# Altium PCB BetaBake_REV_1.0.PcbDoc (part 1 of 8)
Units mil, origin at the board's own origin, x right, y up, seen from the top; angles counter-clockwise.
Board outline 6000 x 4000 mil, 8 copper layers (USB 2.0 (90 Diff) DDR3 Data (50-100), GND (Top Layer high-speed return paths), DDR3 Fly-by Routing (Address, Command, Control), QSPI Flash (Clk, IO), Int4 PWR, Int5 GND (Shielding between L4 and L6), Int6 eMMC High-Speed Data Lines (8-bit bus), SDIO/peripherals, Int7 GND, Escapes, non-critical tracks, decoupling capacitor vias), stack 60.424 mil thick; 426 components, 331 nets, 1941 pads, 428 vias.
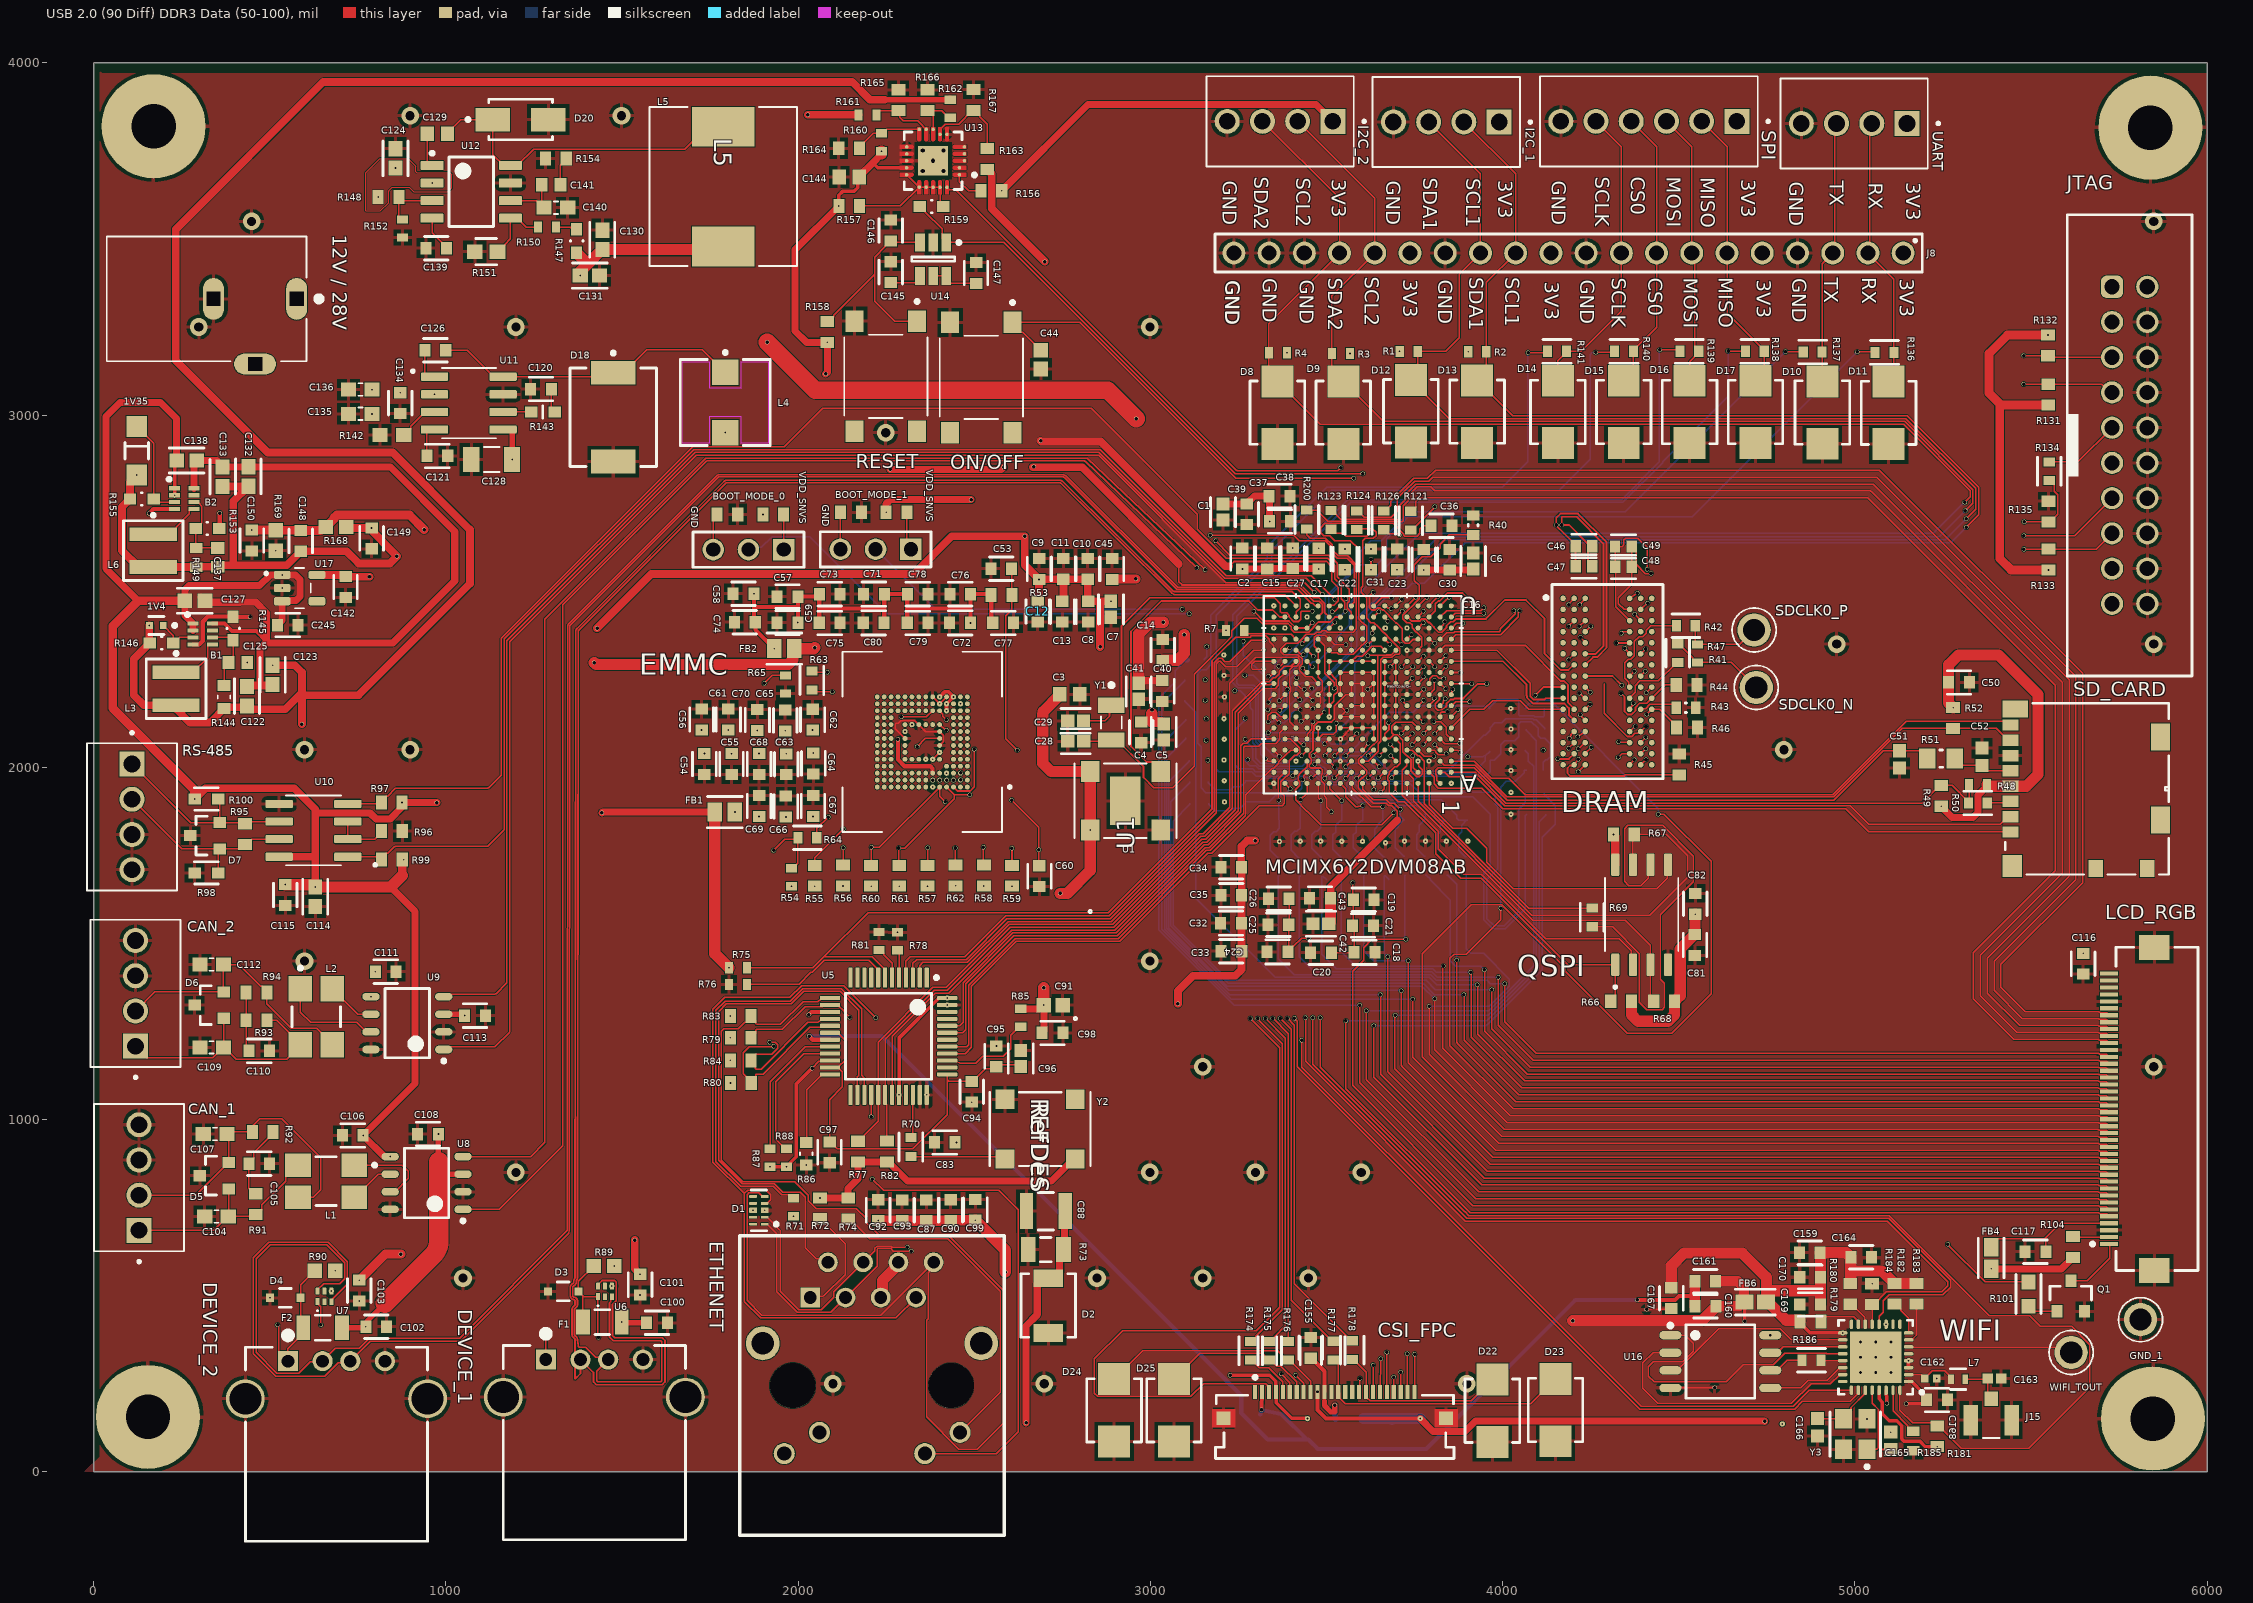
[diagram p0: USB 2.0 (90 Diff) DDR3 Data (50-100) view]
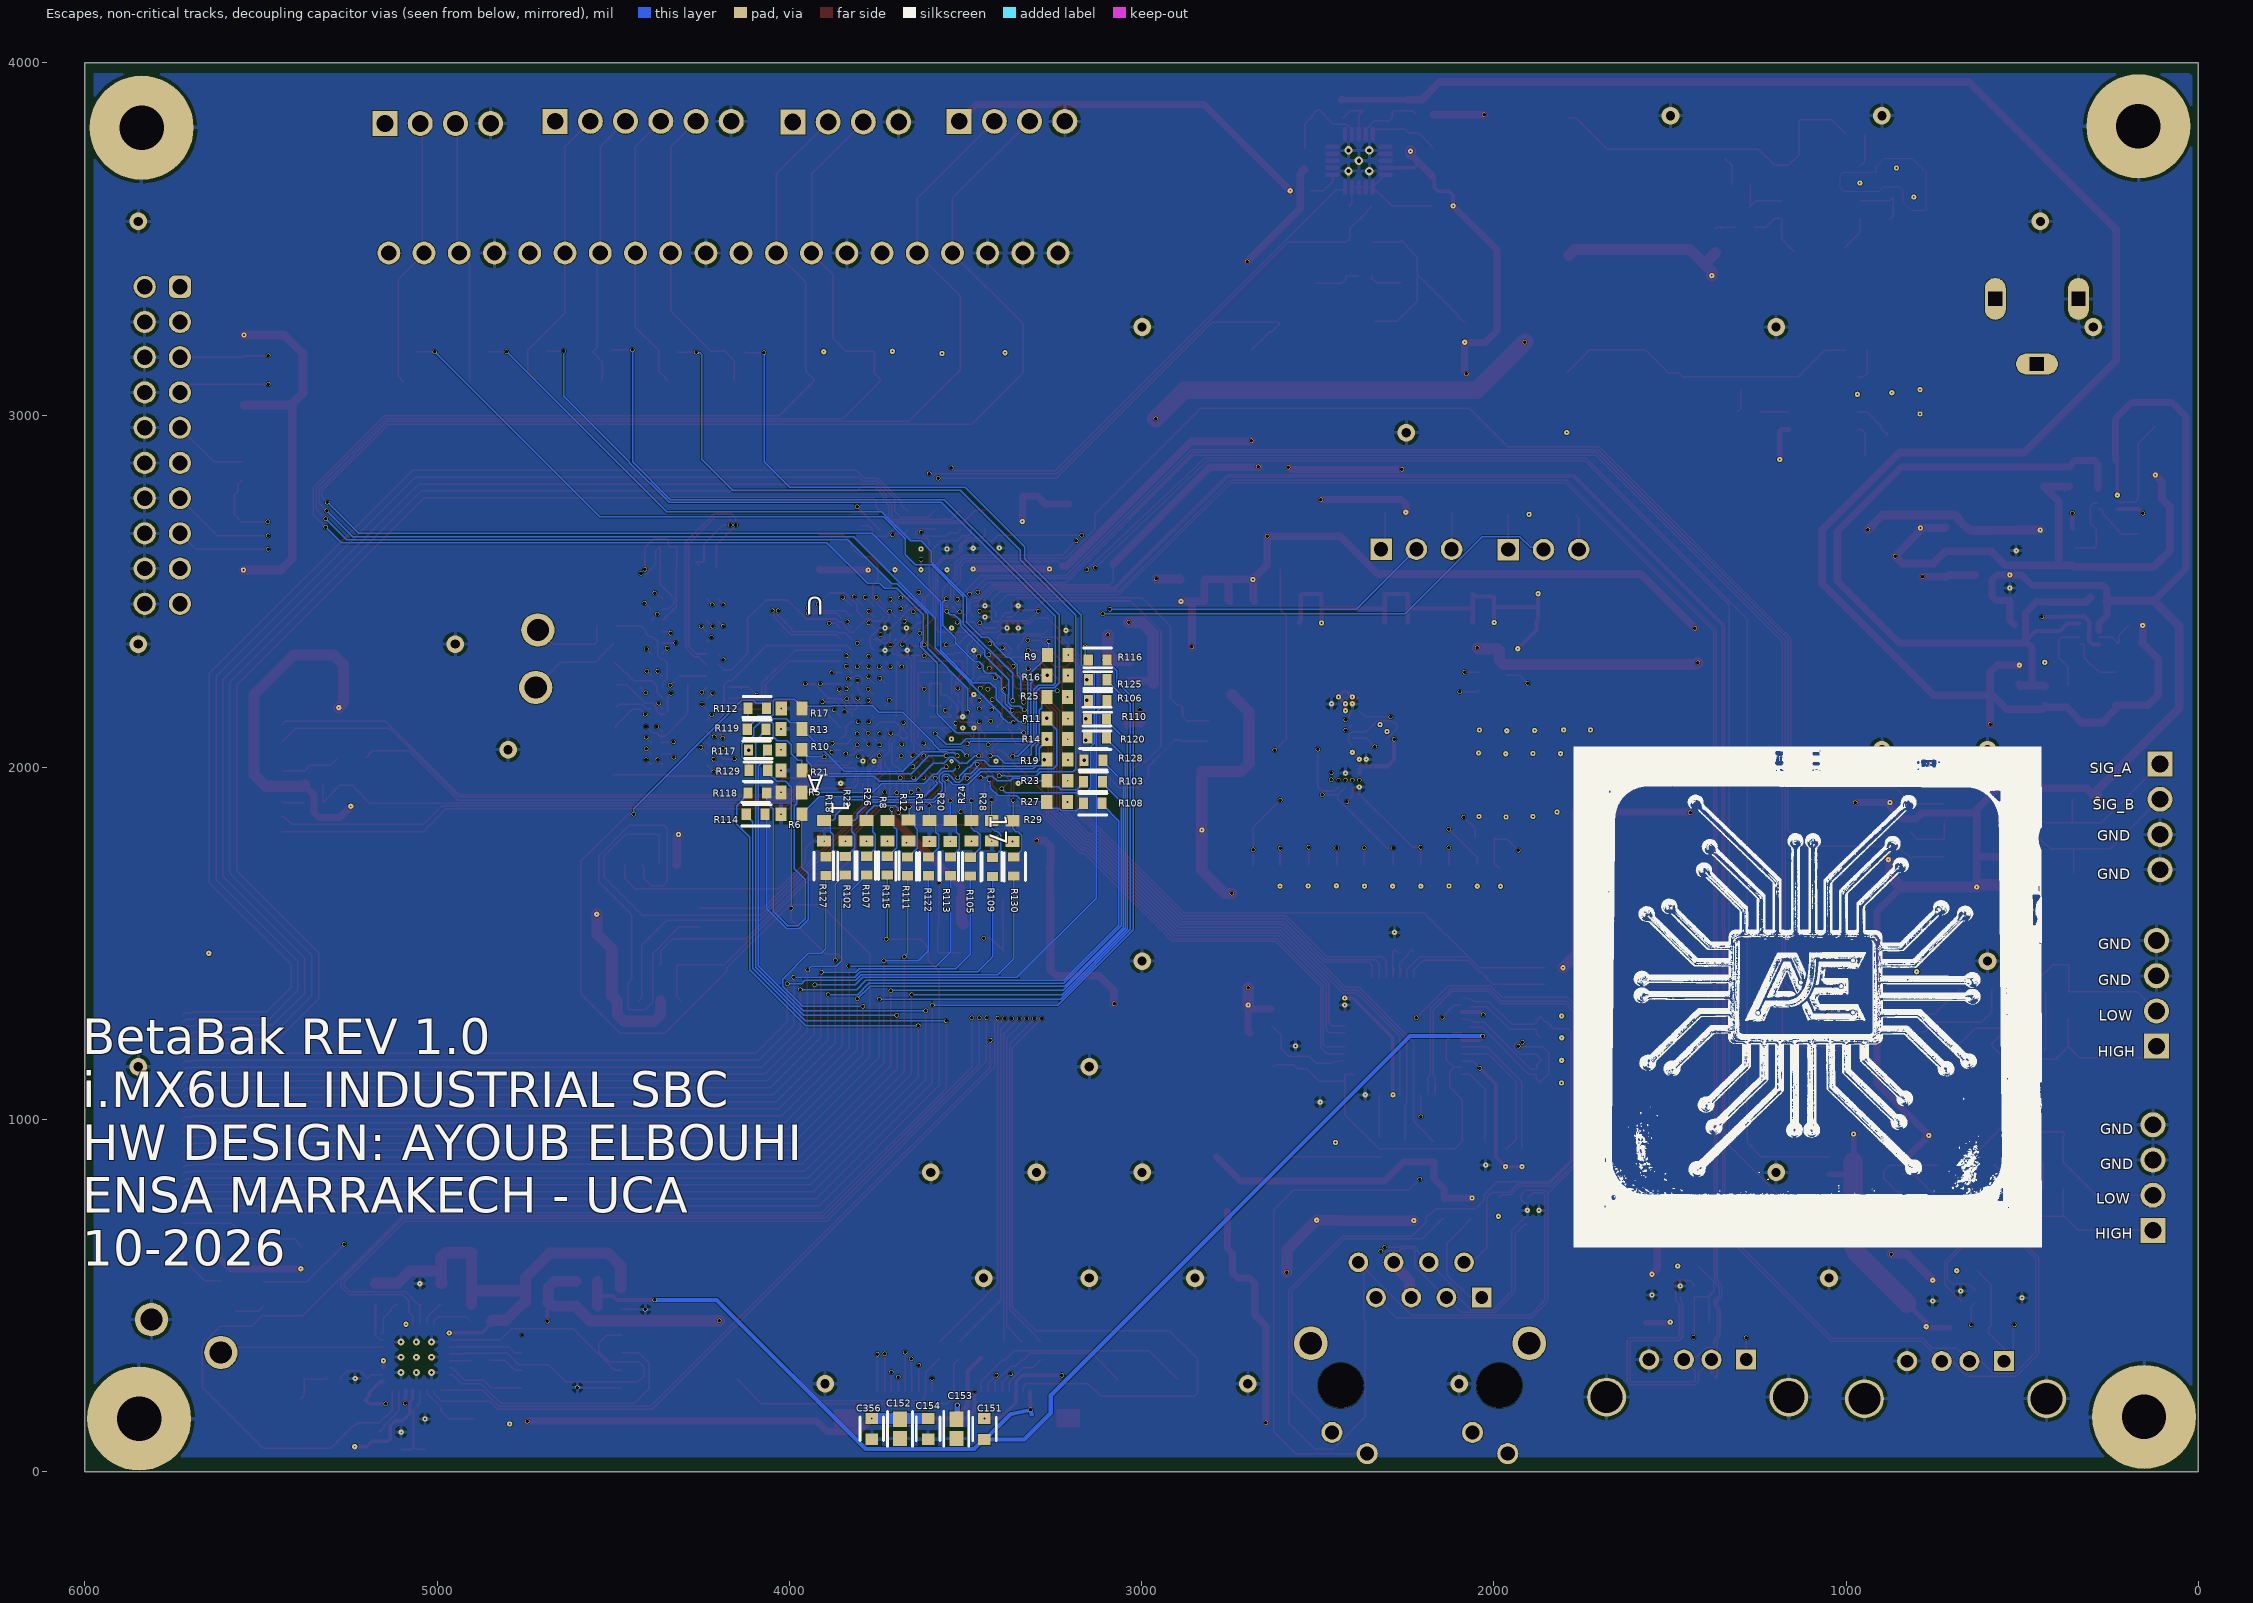
[diagram p1: Escapes, non-critical tracks, decoupling capacitor vias view, seen from below]
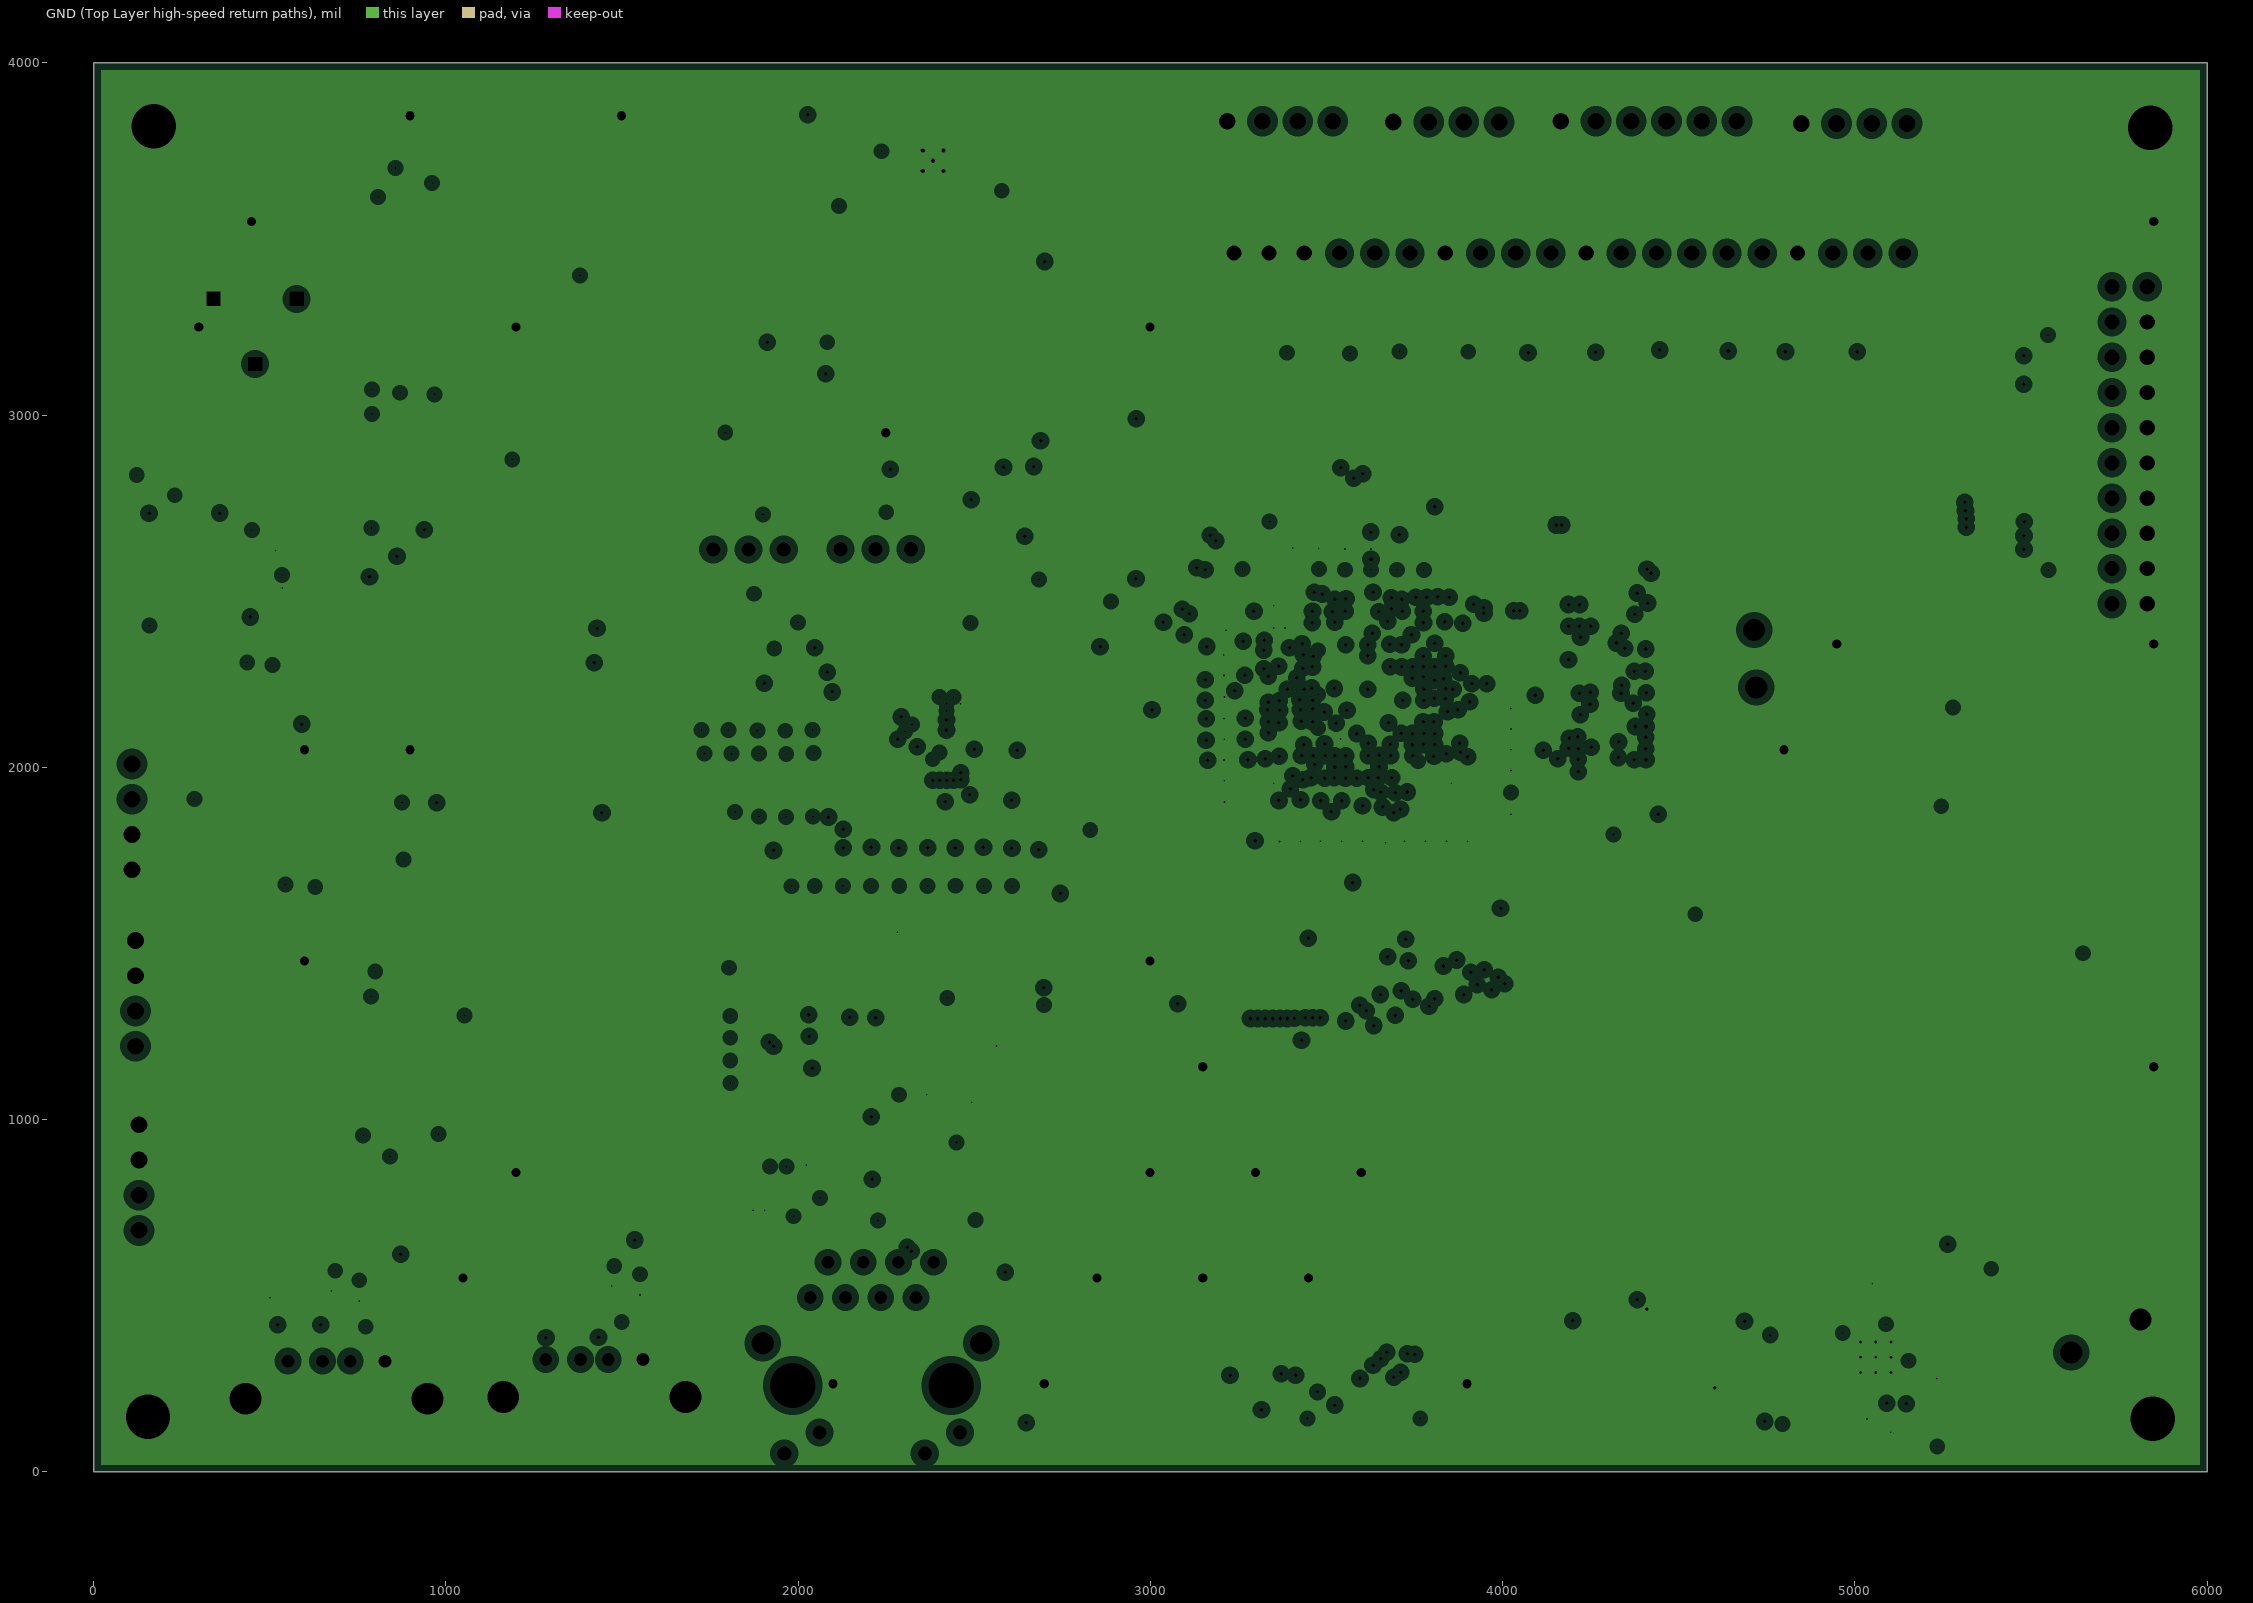
[diagram p2: GND (Top Layer high-speed return paths), clearances drawn from the general rule]
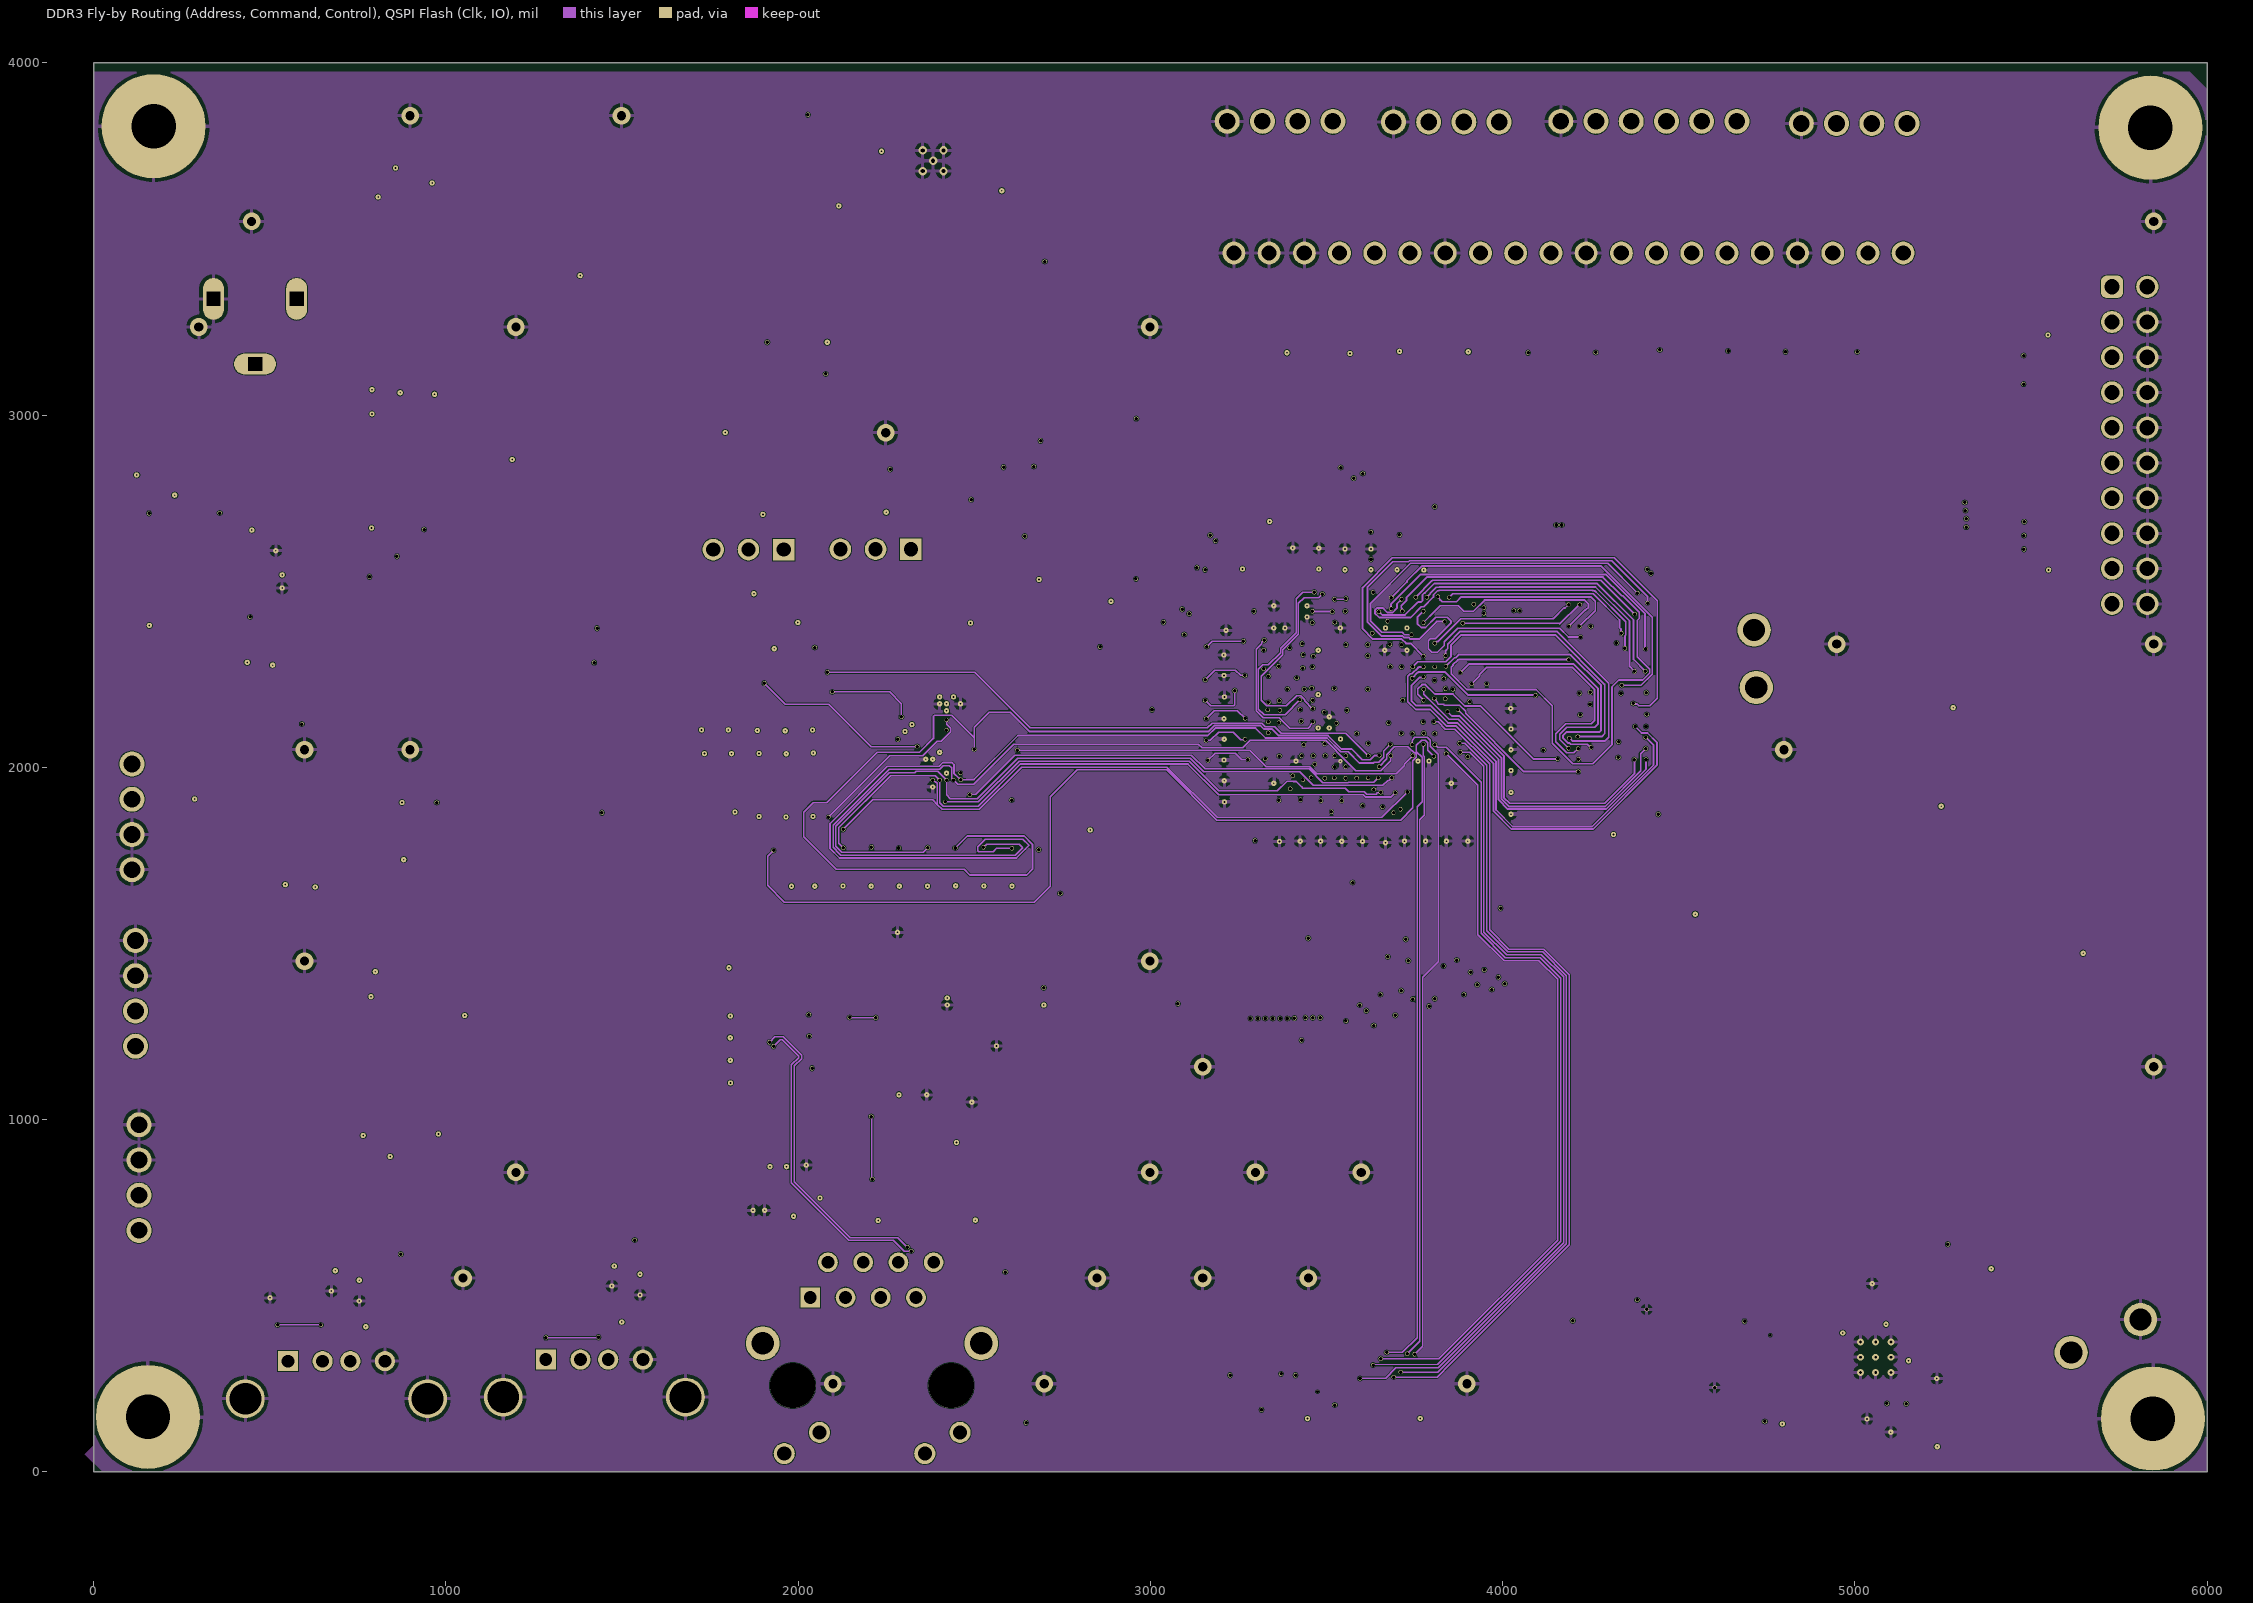
[diagram p3: DDR3 Fly-by Routing (Address, Command, Control), QSPI Flash (Clk, IO)]
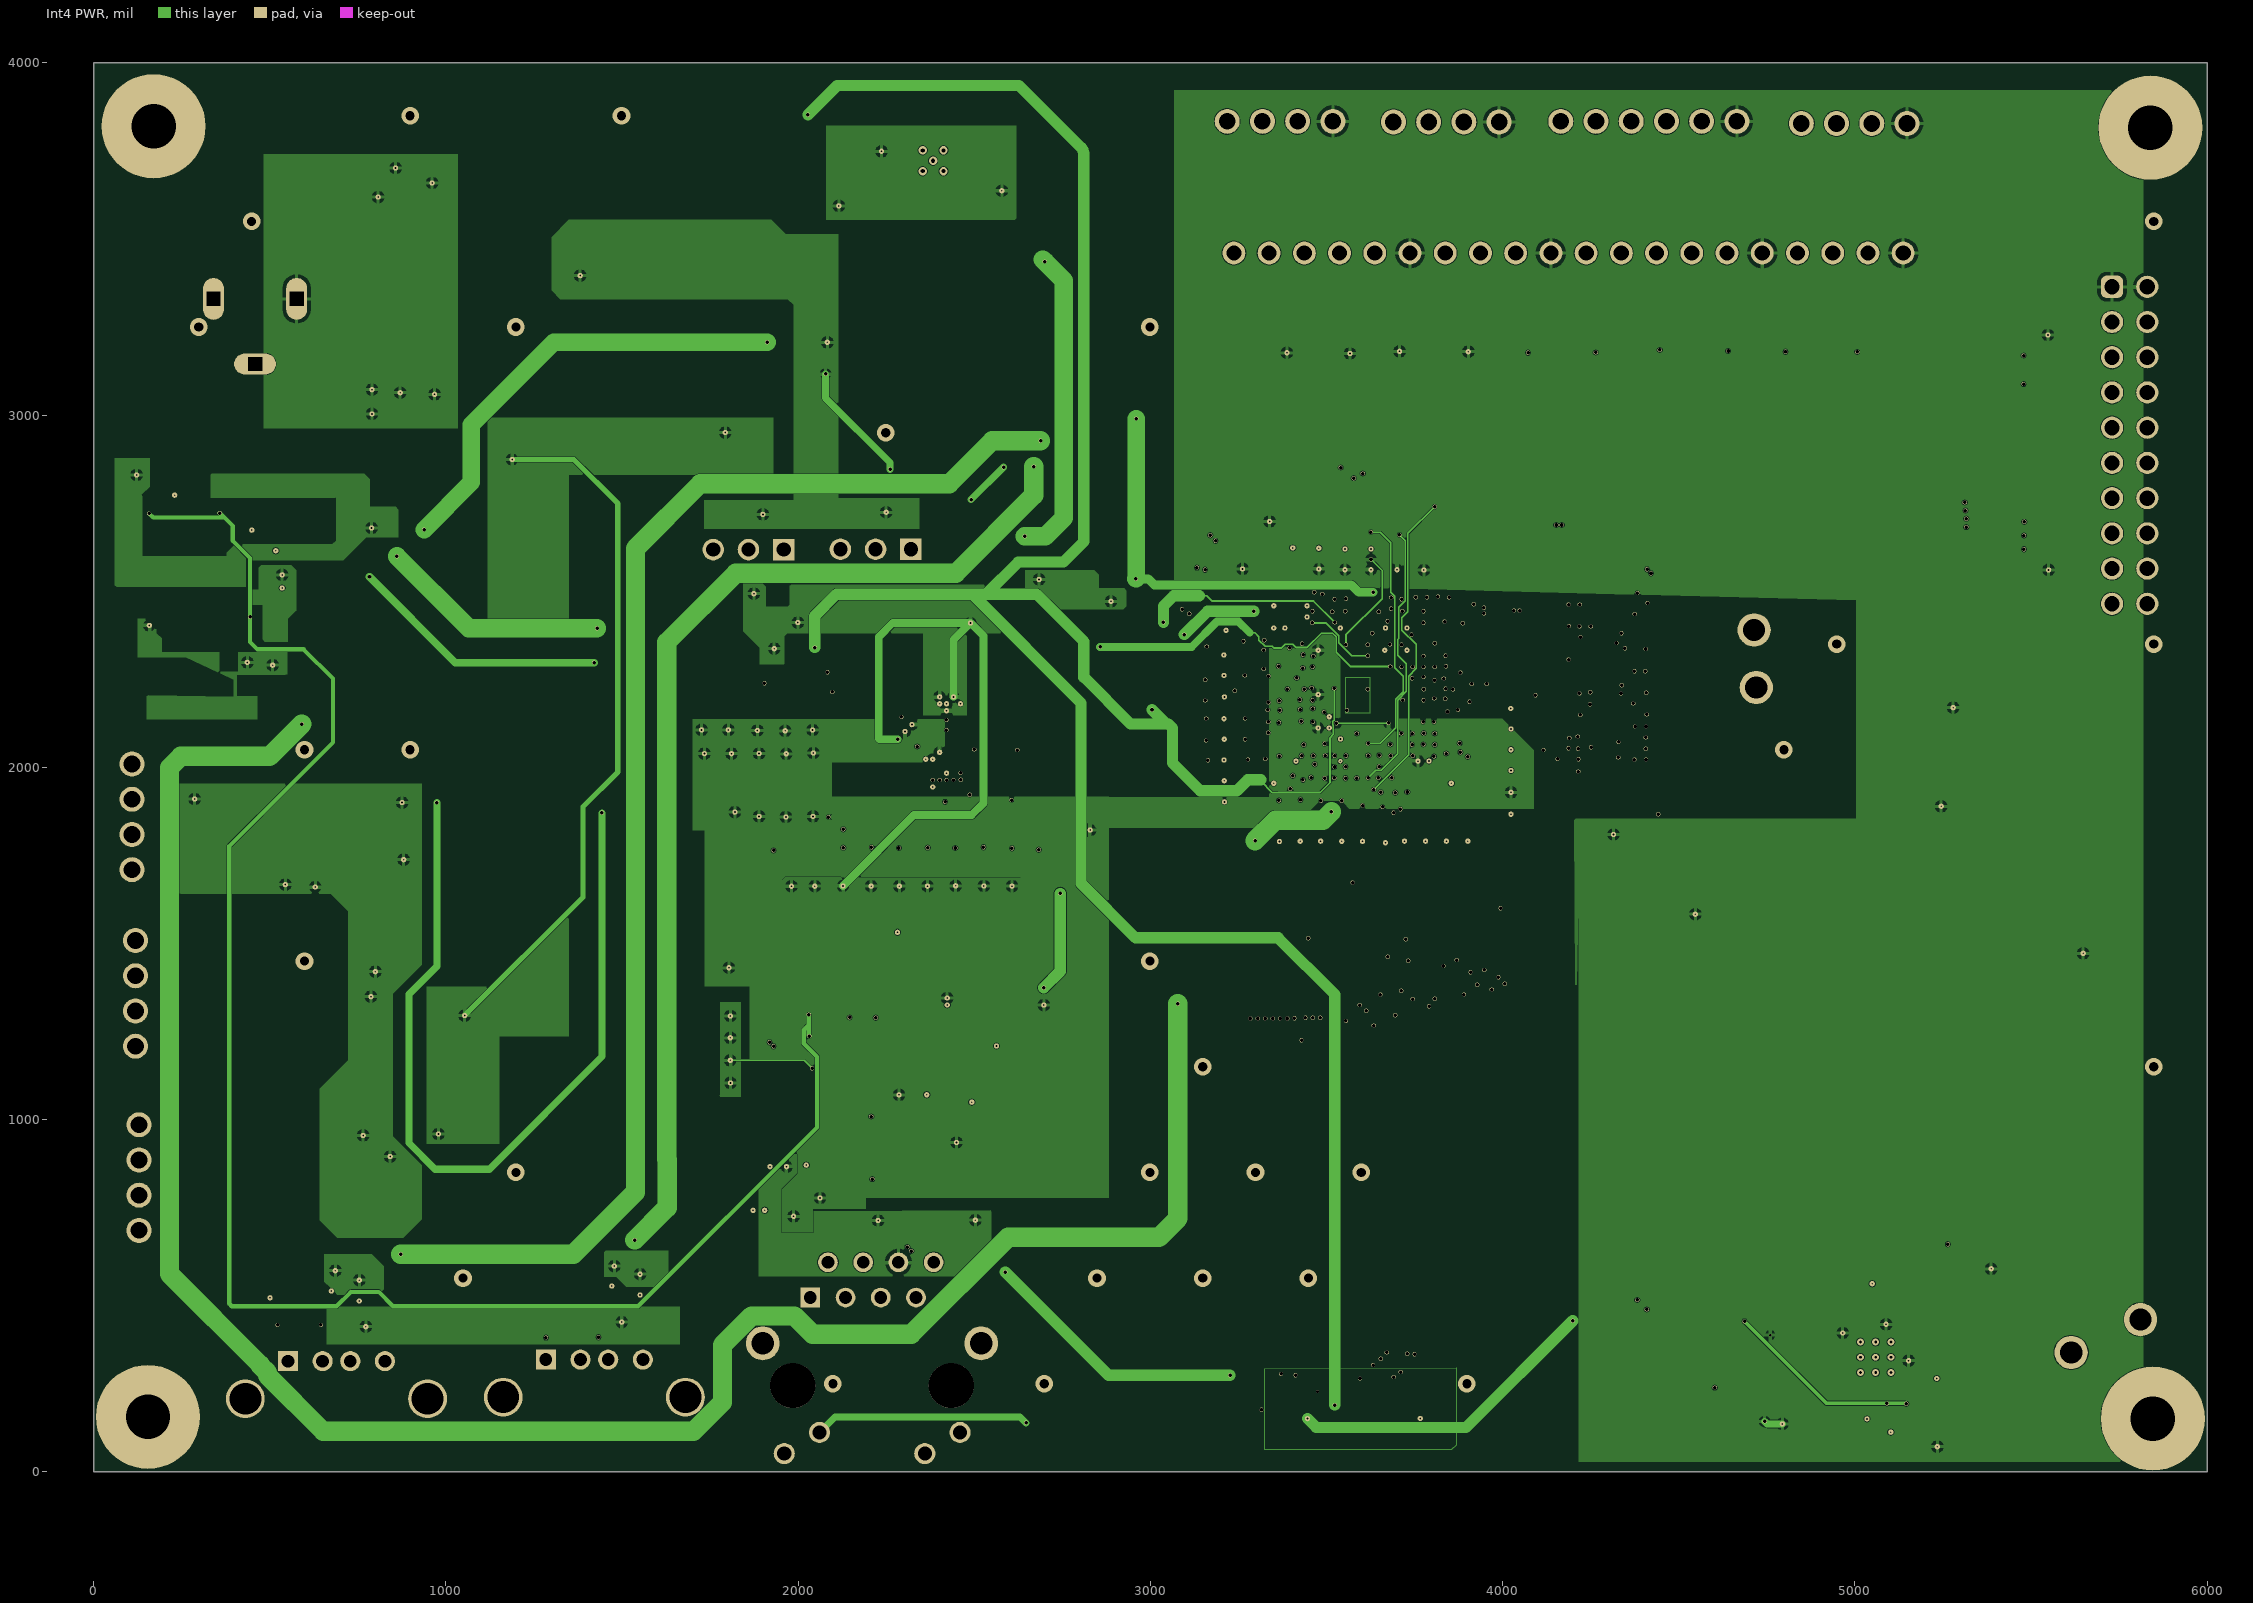
[diagram p4: Int4 PWR]
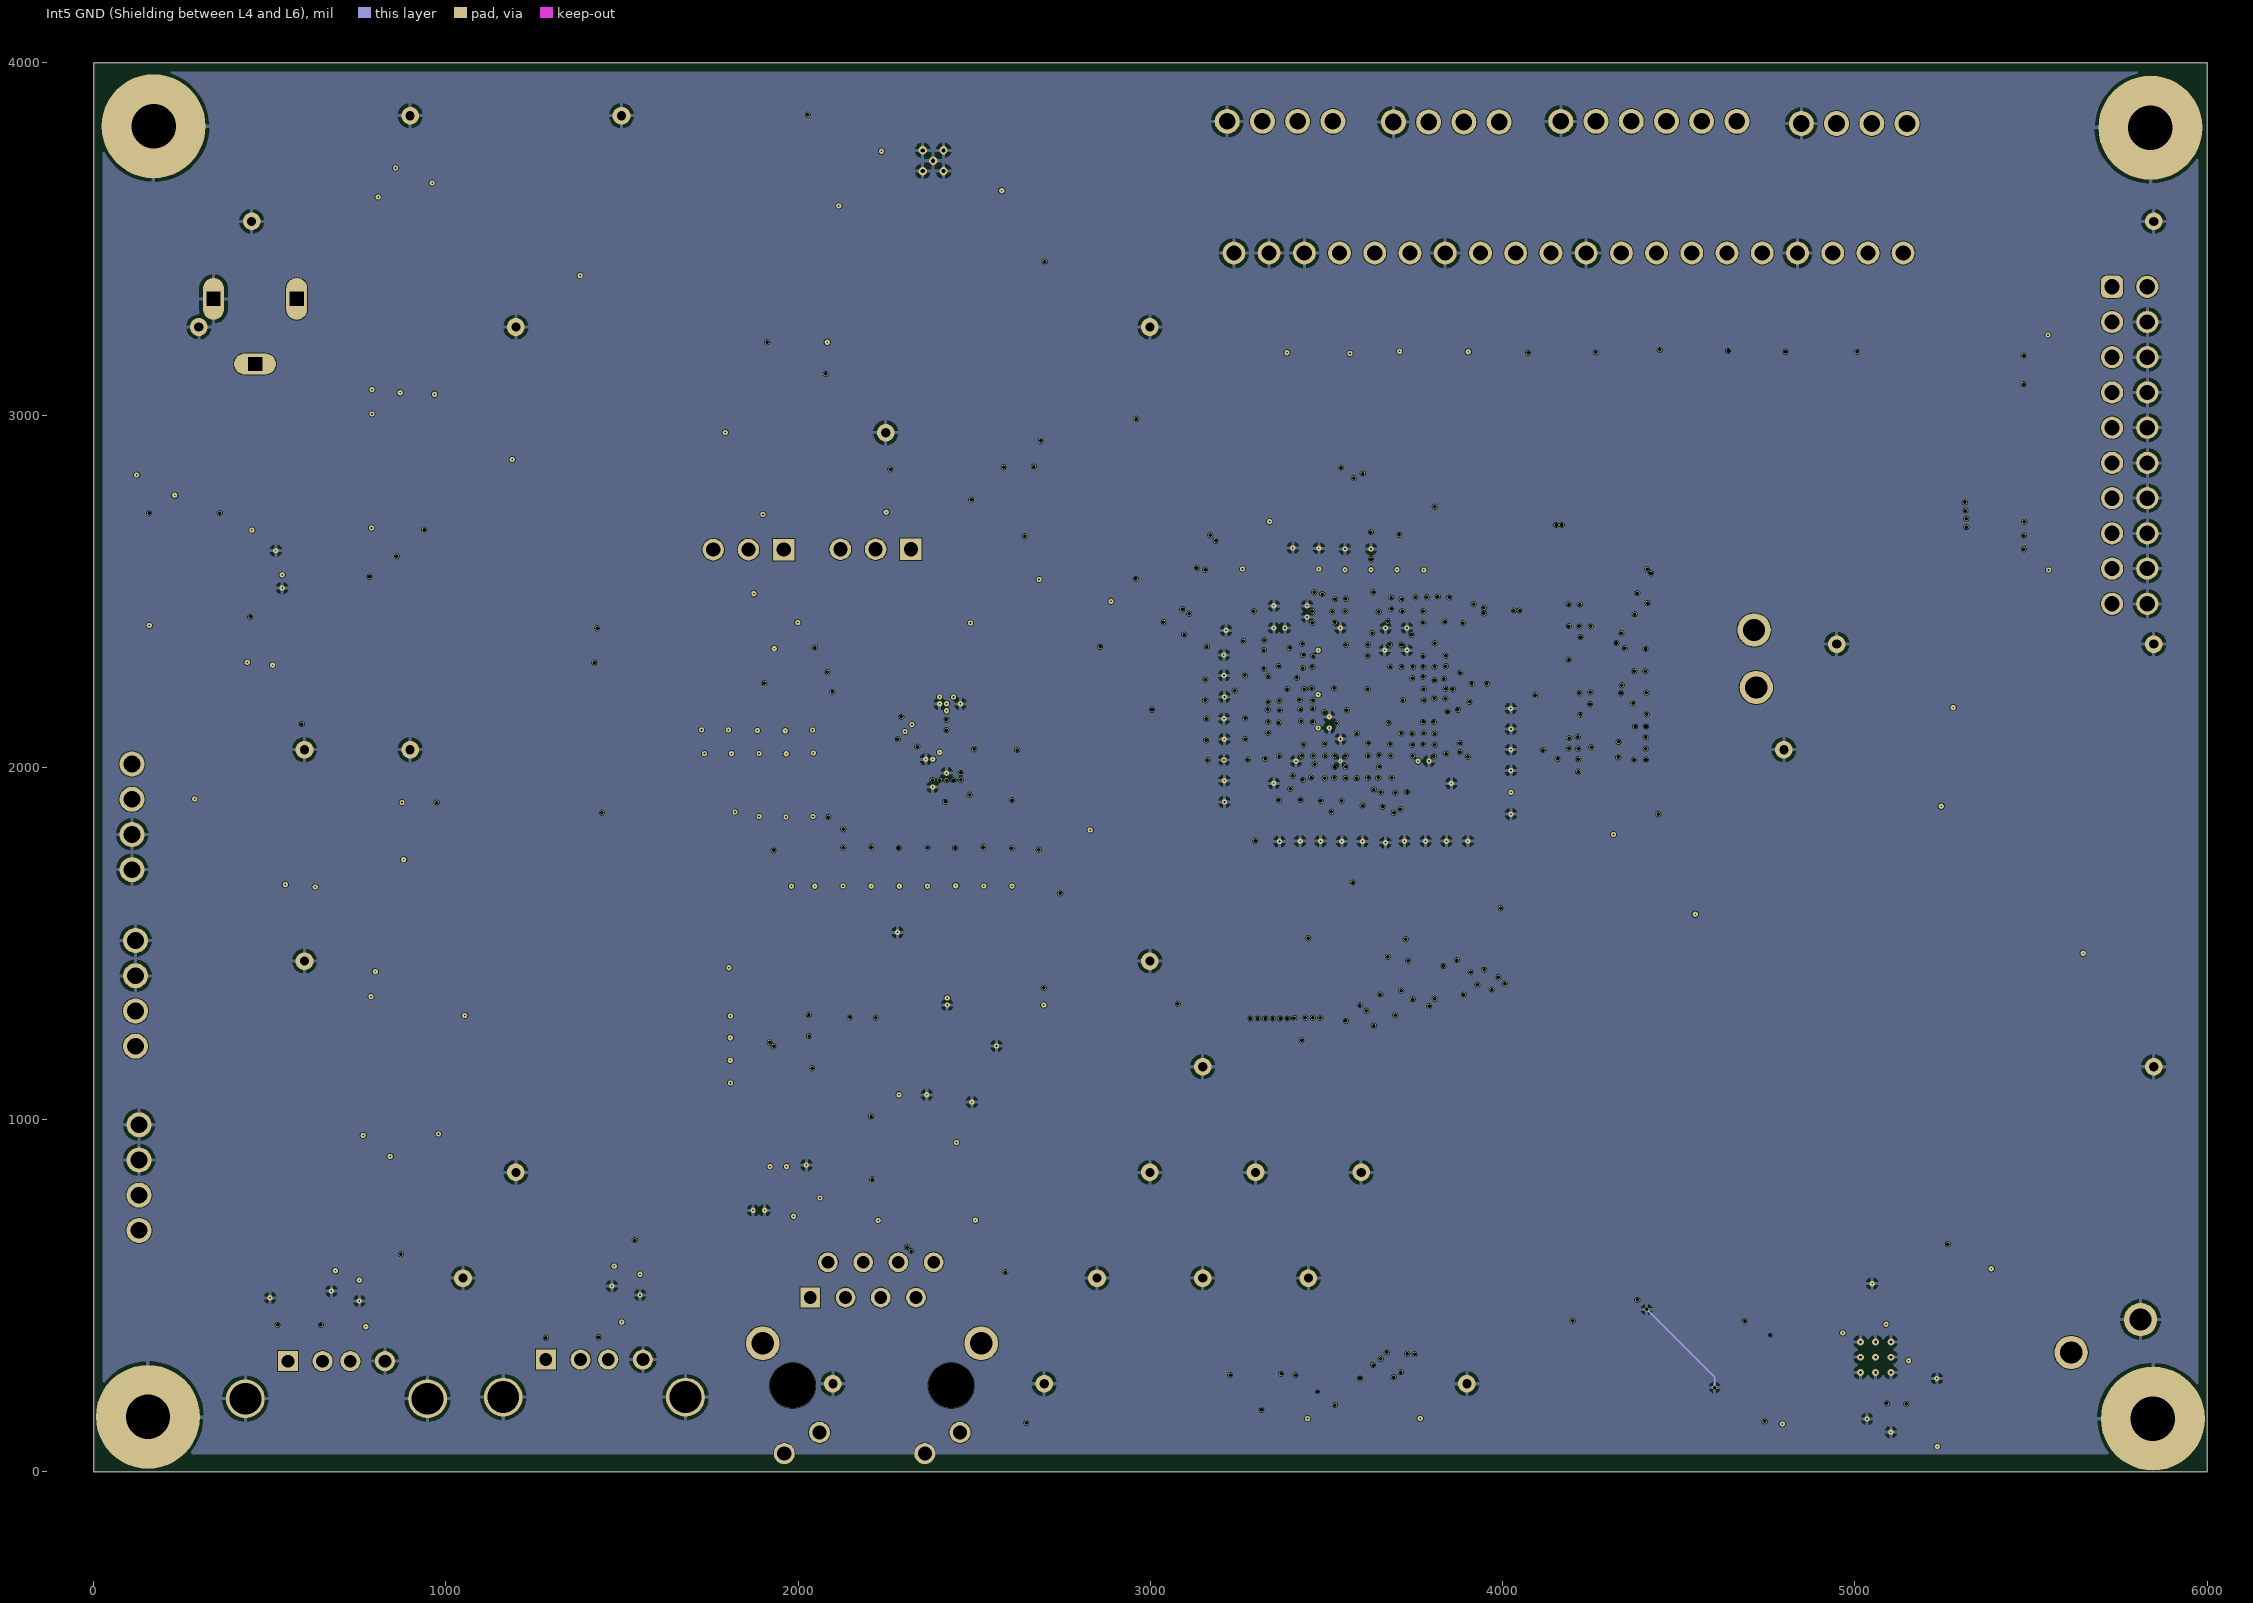
[diagram p5: Int5 GND (Shielding between L4 and L6)]
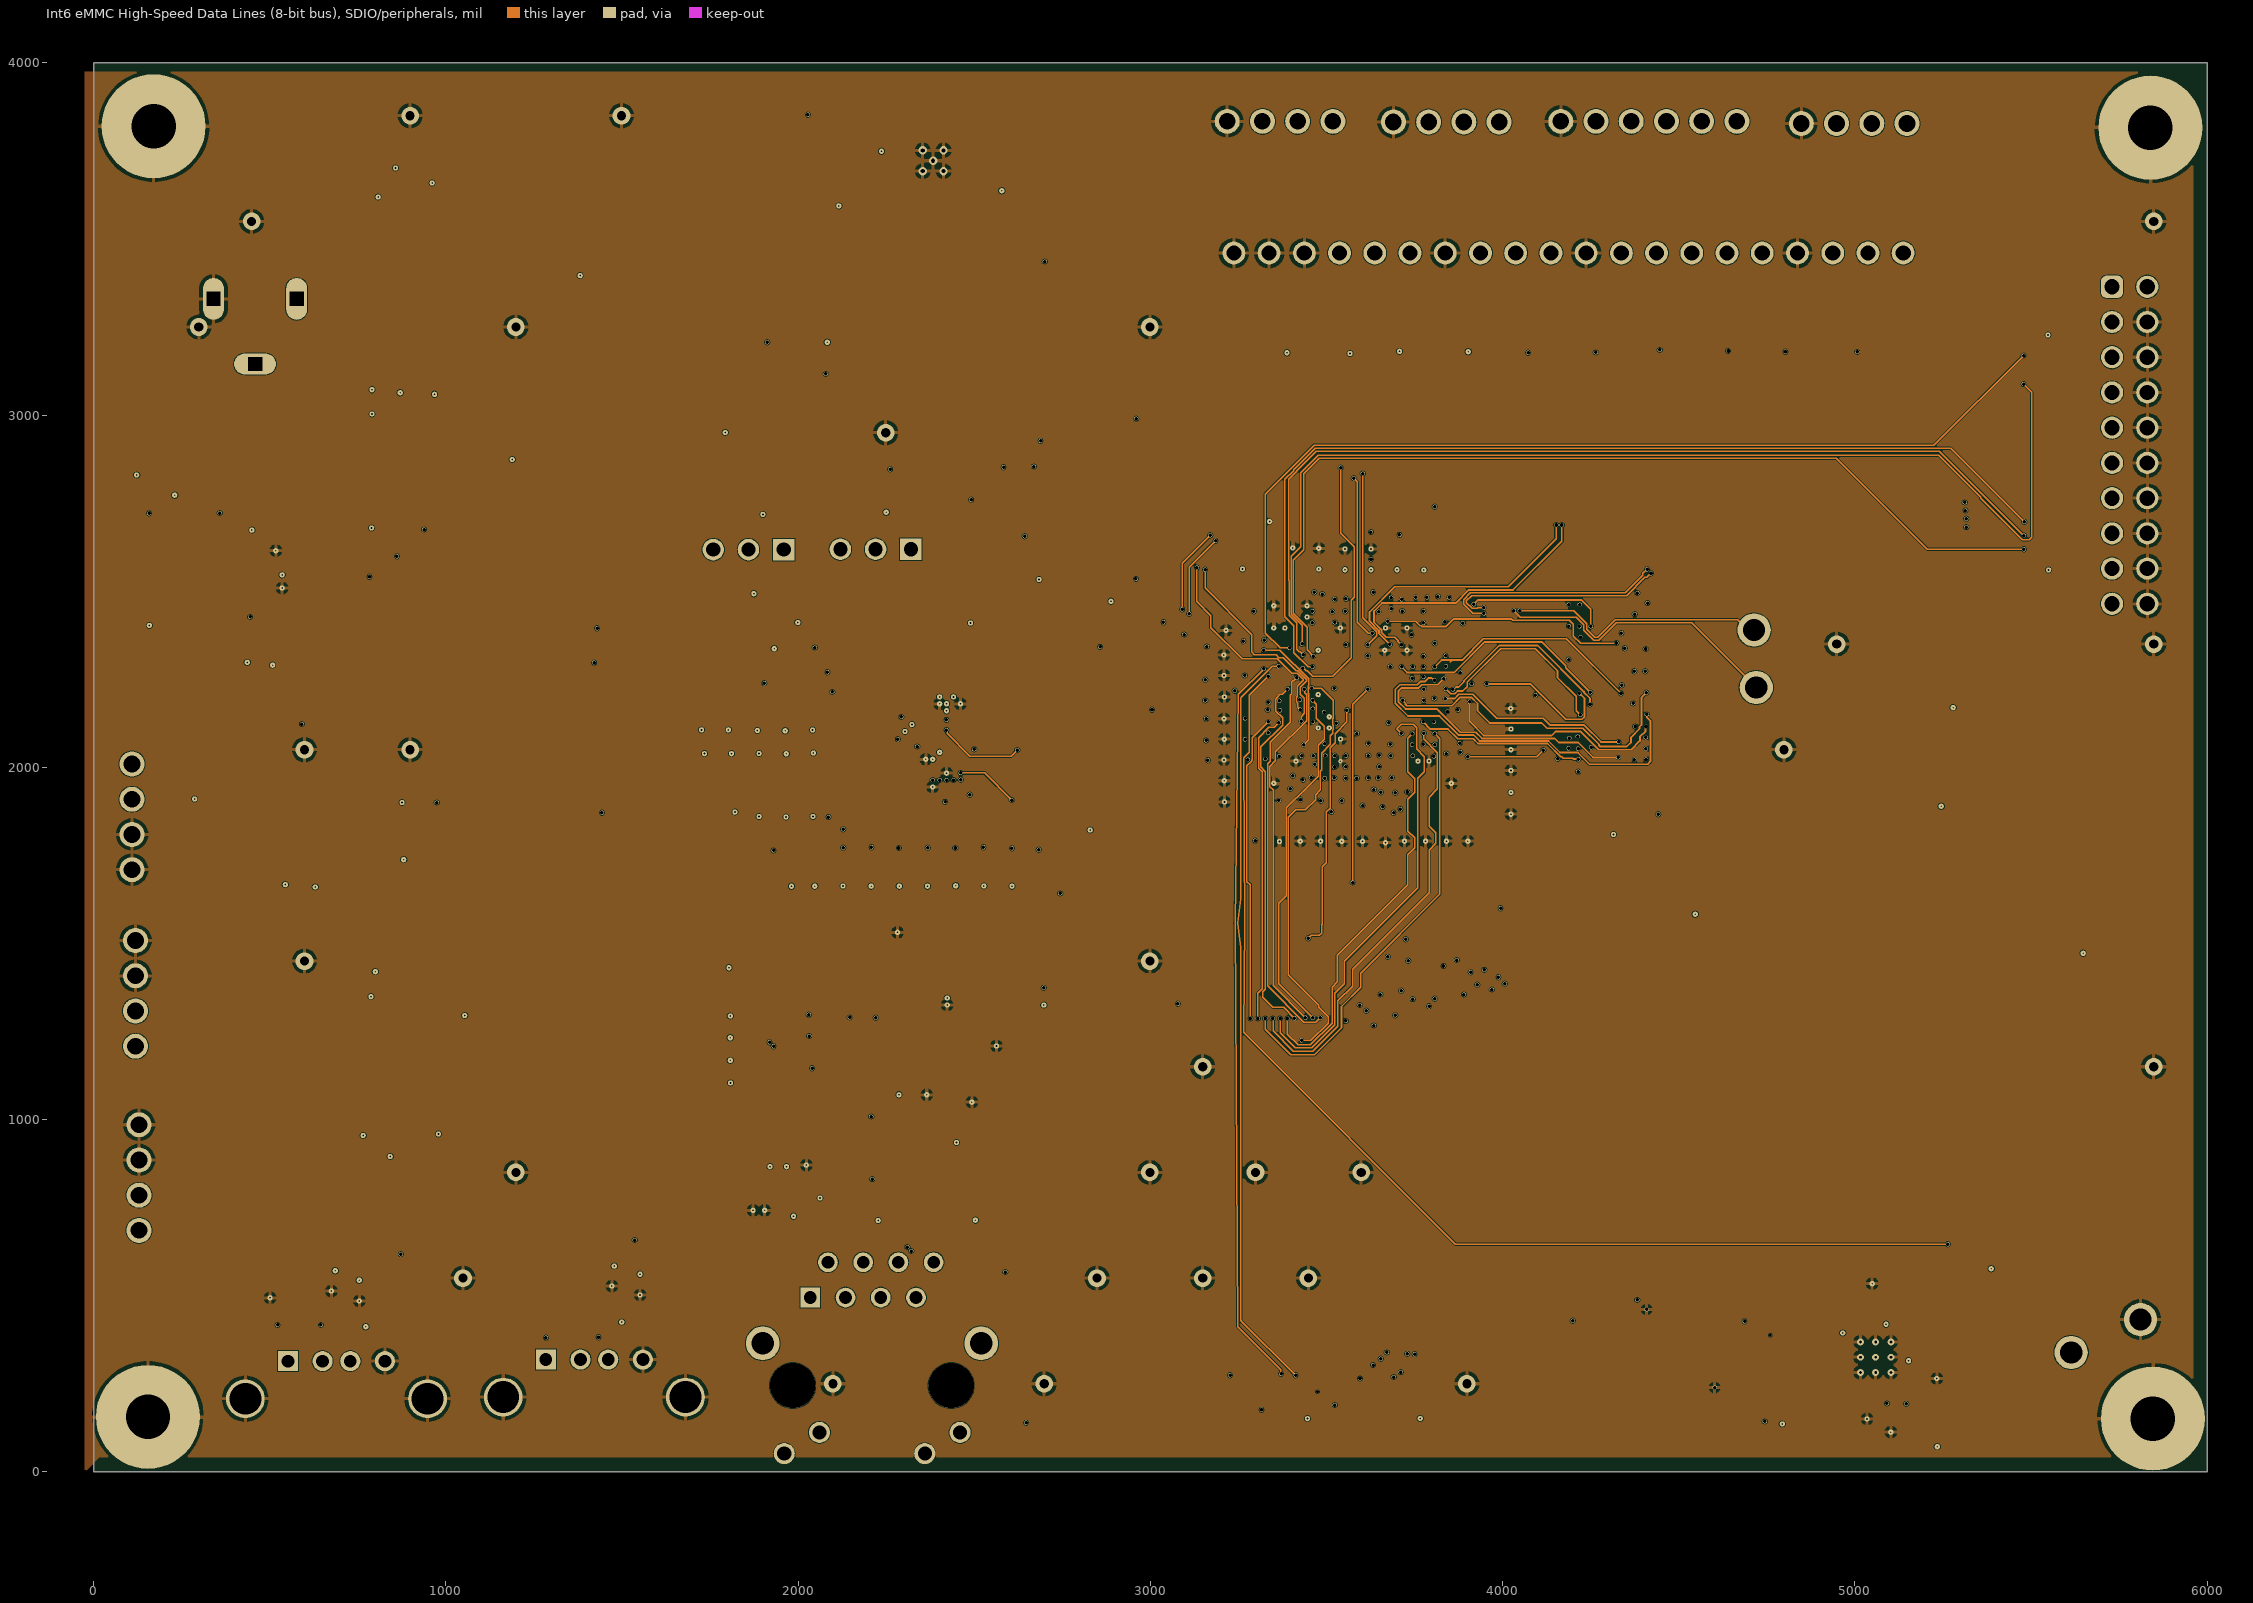
[diagram p6: Int6 eMMC High-Speed Data Lines (8-bit bus), SDIO/peripherals]
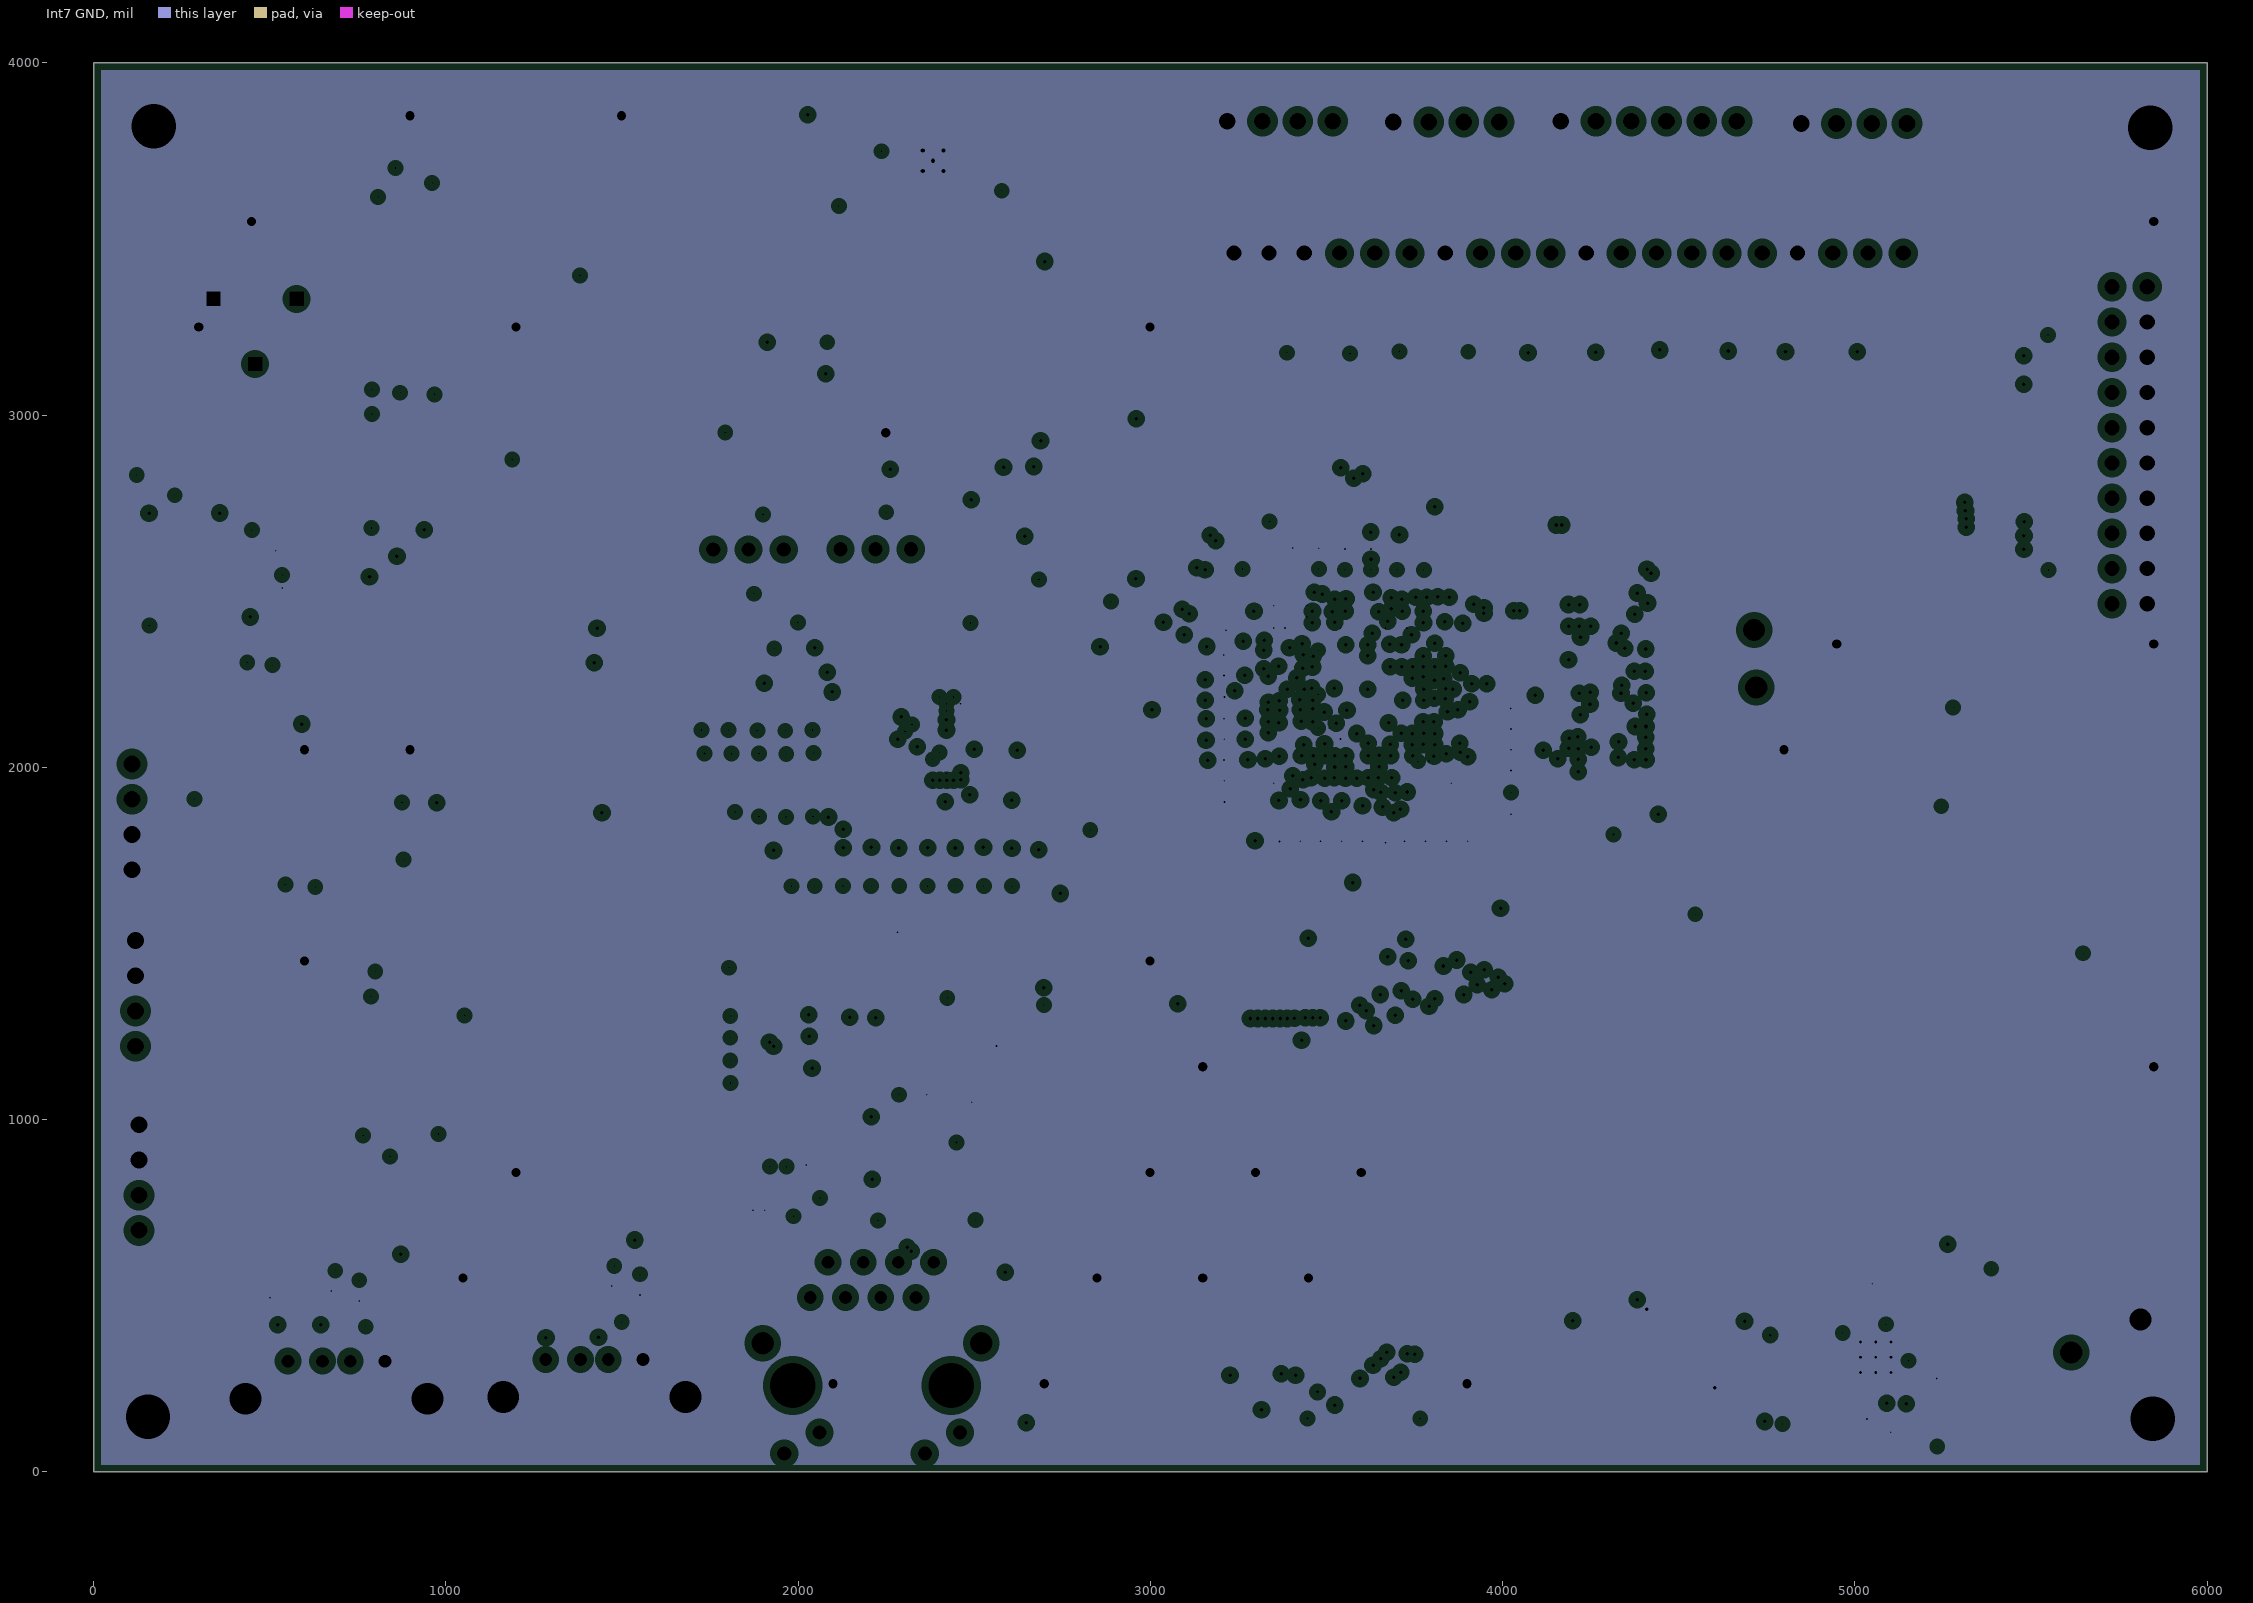
[diagram p7: Int7 GND, clearances drawn from the general rule]
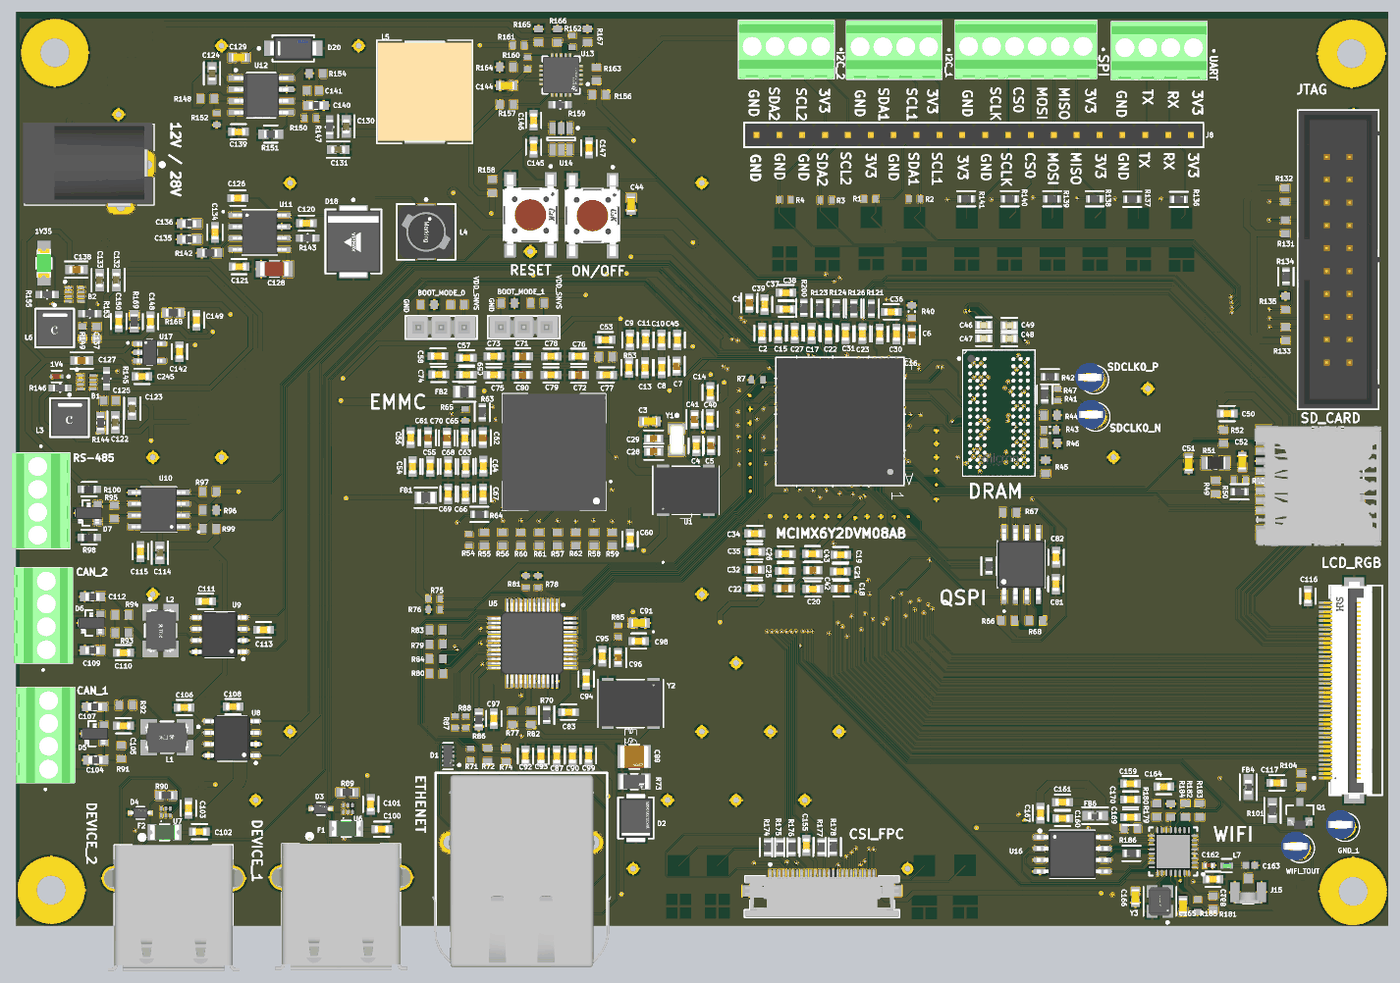
[diagram p14: 3D render of the assembled board from above, using the file's embedded part models]
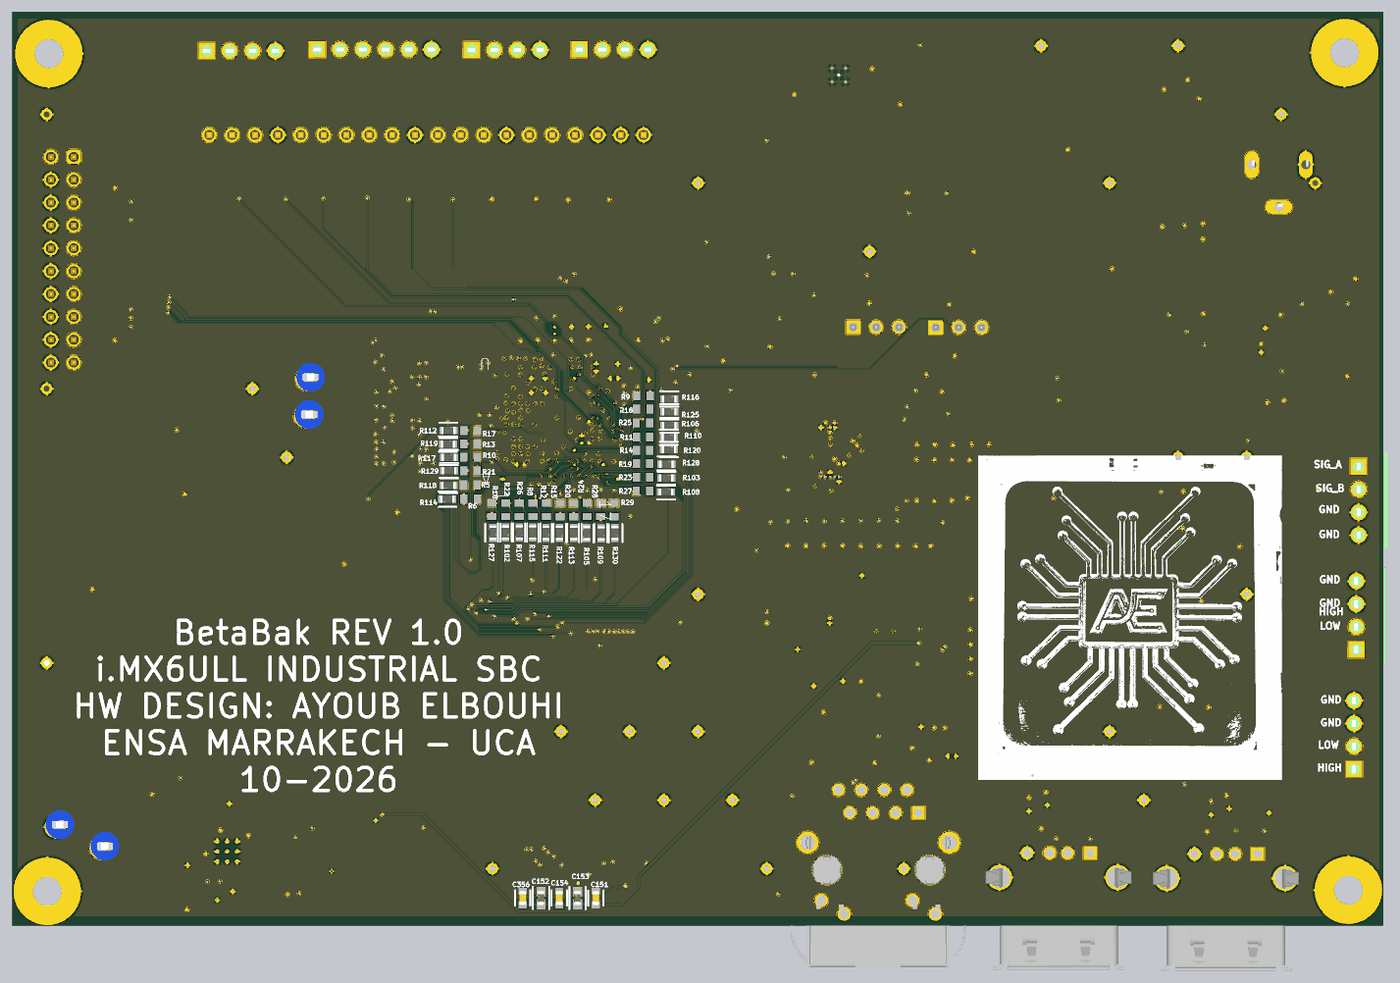
[diagram p15: 3D render of the assembled board from below, using the file's embedded part models]

## Layer stack, top to bottom
Top Solder: solder mask 1, SM-001, Dk 4
USB 2.0 (90 Diff) DDR3 Data (50-100): signal copper 1.378
Dielectric 1: prepreg 2.8, PP-006, Dk 4.1
Dielectric 2: prepreg 2.8, PP-006, Dk 4.1
GND (Top Layer high-speed return paths): plane copper 1.378, net GND
Dielectric 3: core 9, Core-027, Dk 4.5
DDR3 Fly-by Routing (Address, Command, Control), QSPI Flash (Clk, IO): signal copper 1.378
Dielectric 4: prepreg 2.8, PP-006, Dk 4.1
Dielectric 5: prepreg 2.8, PP-006, Dk 4.1
Int4 PWR: signal copper 1.378
Dielectric 6: core 9, Core-027, Dk 4.5
Int5 GND (Shielding between L4 and L6): signal copper 1.378
Dielectric 7: prepreg 2.8, PP-006, Dk 4.1
Dielectric 8: prepreg 2.8, PP-006, Dk 4.1
Int6 eMMC High-Speed Data Lines (8-bit bus), SDIO/peripherals: signal copper 1.378
Dielectric 9: core 9, Core-027, Dk 4.5
Int7 GND: plane copper 1.378, net GND
Dielectric 10: prepreg 2.8, PP-006, Dk 4.1
Dielectric 11: prepreg 2.8, PP-006, Dk 4.1
Escapes, non-critical tracks, decoupling capacitor vias: signal copper 1.378
Bottom Solder: solder mask 1, SM-001, Dk 4

## Board outline
0,0 6000,0 6000,4000 0,4000

## Design rules (kind name [scope] priority, off if disabled: settings)
Clearance Clearance_BGA [InComponent('U79')] p1: gap=2 ignorepadtopadclearanceinfootprint=FALSE
Clearance [All] p2: gap=2 ignorepadtopadclearanceinfootprint=FALSE
DiffPairsRouting DiffPairs_BGA [InComponent('U79')] p1: maxlimit=4 minlimit=4 mostfreqgap=4 toplayer_minwidth=4 toplayer_maxwidth=4 toplayer_prefwidth=4 midlayer1_minwidth=4 midlayer1_maxwidth=4 midlayer1_prefwidth=4 midlayer2_minwidth=4 midlayer2_maxwidth=4 midlayer2_prefwidth=4 midlayer3_minwidth=4 midlayer3_maxwidth=4 midlayer3_prefwidth=4 midlayer4_minwidth=4 midlayer4_maxwidth=4 midlayer4_prefwidth=4 bottomlayer_minwidth=4 bottomlayer_maxwidth=4 bottomlayer_prefwidth=4 maxuncoupledlength=500
DiffPairsRouting Diff_100Ohm [InDifferentialPairClass('100Ohm_DIFF')] p2: maxlimit=10 minlimit=7 mostfreqgap=10 toplayer_mingap=8 toplayer_maxgap=8 toplayer_prefgap=8 toplayer_minwidth=4.41 toplayer_maxwidth=4.41 toplayer_prefwidth=4.41 midlayer1_maxgap=7 midlayer1_prefgap=7 midlayer1_minwidth=3.62 midlayer1_maxwidth=3.62 midlayer1_prefwidth=3.62 midlayer2_mingap=10 midlayer2_minwidth=15 midlayer2_maxwidth=15 midlayer2_prefwidth=15 midlayer3_maxgap=7 midlayer3_prefgap=7 midlayer3_minwidth=3.62 midlayer3_maxwidth=3.62 midlayer3_prefwidth=3.62 midlayer4_mingap=10 midlayer4_minwidth=15 midlayer4_maxwidth=15 midlayer4_prefwidth=15 bottomlayer_mingap=8 bottomlayer_maxgap=8 bottomlayer_prefgap=8 bottomlayer_minwidth=4.41 bottomlayer_maxwidth=4.41 bottomlayer_prefwidth=4.41 maxuncoupledlength=500
DiffPairsRouting Diff_90Ohm [InDifferentialPairClass('90Ohm_DIFF')] p3: maxlimit=9 minlimit=6 mostfreqgap=8 toplayer_mingap=7 toplayer_minwidth=5 toplayer_maxwidth=6 toplayer_prefwidth=5.51 midlayer1_maxgap=8 midlayer1_prefgap=7 midlayer1_minwidth=3.8 midlayer1_maxwidth=5 midlayer1_prefwidth=4.33 midlayer2_mingap=7 midlayer2_minwidth=5 midlayer2_maxwidth=6 midlayer2_prefwidth=5.51 midlayer3_maxgap=8 midlayer3_prefgap=7 midlayer3_minwidth=3.8 midlayer3_maxwidth=5 midlayer3_prefwidth=4.33 midlayer4_mingap=7 midlayer4_minwidth=5 midlayer4_maxwidth=6 midlayer4_prefwidth=5.51 bottomlayer_mingap=7 bottomlayer_minwidth=5 bottomlayer_maxwidth=6 bottomlayer_prefwidth=5.51 maxuncoupledlength=500
FanoutControl Fanout_BGA [All] p1: bgadir=Out bgaviamode=Centered fanoutstyle=Auto fanoutdirection=Alternating viagrid=1 // Fanout_BGA (Default Rule)
HoleSize [All] p1: absolutevalues=TRUE maxlimit=150 minlimit=5 maxpercent=80.000 minpercent=20.000
HoleToHoleClearance [All] p1: gap=0 allowstackedmicrovias=TRUE
MinimumSolderMaskSliver [All] p1: minsoldermaskwidth=0
NetAntennae [All] p1: netantennaetolerance=5
PlaneClearance [All] p1: clearance=20
PlaneConnect [All] p1: planeconnectstyle=Direct reliefexpansion=20 reliefentries=4 reliefconductorwidth=10 reliefairgap=10
PolygonConnect [All] p1: connectstyle=Relief reliefconductorwidth=10 reliefentries=4 polygonreliefangle="90 Angle" airgapwidth=10
RoutingVias Via_BGA [All] p1: holewidth=10 width=12 viastyle="Through Hole" minholewidth=10 minwidth=12 maxholewidth=10 maxwidth=12
SilkToSilkClearance [All] p1: silktosilkclearance=0
SilkToSolderMaskClearance [IsPad] p1: minsilkscreentomaskgap=0 clearancetoexposedcopper=TRUE
SolderMaskExpansion [All] p1: expansion=4 istentingtop=FALSE
Width Width_BGA [InComponent('U79')] p1: maxlimit=4 minlimit=4 preferedwidth=4
Width Width_50Ohm [InNetClass('50Ohm_SE')] p2: maxlimit=10 minlimit=4.92 preferedwidth=10 toplayer_minwidth=5.12 toplayer_maxwidth=6.1 toplayer_prefwidth=5.63 midlayer1_maxwidth=5.91 midlayer1_prefwidth=5.43 midlayer2_minwidth=10 midlayer3_maxwidth=5.91 midlayer3_prefwidth=5.43 midlayer4_minwidth=10 bottomlayer_minwidth=5.12 bottomlayer_maxwidth=6.1 bottomlayer_prefwidth=5.63 minimp=50.000000 maximp=50.000000 favimp=50.000000
Width [All] p3: maxlimit=60 minlimit=1 preferedwidth=4
20 further rules are at their usual default settings.

## Classes and differential pairs
net class EMMC_DATA[7..0]: EMMC_DATA0 EMMC_DATA1 EMMC_DATA2 EMMC_DATA3 EMMC_DATA4 EMMC_DATA5 EMMC_DATA6 EMMC_DATA7
net class DRAM_DATA[15..0]: DRAM_DATA0 DRAM_DATA1 DRAM_DATA2 DRAM_DATA3 DRAM_DATA4 DRAM_DATA5 DRAM_DATA6 DRAM_DATA7 DRAM_DATA8 DRAM_DATA9 DRAM_DATA10 DRAM_DATA11 DRAM_DATA12 DRAM_DATA13 DRAM_DATA14 DRAM_DATA15
net class DRAM_ADDR[15..0]: DRAM_ADDR0 DRAM_ADDR1 DRAM_ADDR2 DRAM_ADDR3 DRAM_ADDR4 DRAM_ADDR5 DRAM_ADDR6 DRAM_ADDR7 DRAM_ADDR8 DRAM_ADDR9 DRAM_ADDR10 DRAM_ADDR11 DRAM_ADDR12 DRAM_ADDR13 DRAM_ADDR14 DRAM_ADDR15
net class CSI_DATA[7..0]: CSI_DATA0 CSI_DATA1 CSI_DATA2 CSI_DATA3 CSI_DATA4 CSI_DATA5 CSI_DATA6 CSI_DATA7
component class WIFI: C162 C164 C165 C166 C167 C168 C169 C170 GND_1 J15 L7 R179 R180 R181 R182 R183 R184 R185 R186 TP118 TP119 U16 WIFI WIFI_TOUT Y3
component class CSI: C151 C152 C153 C154 C155 CSI_FPC D22 D23 D24 D25 R174 R175 R176 R177 R178
component class Boot_Cfg: BOOT_MODE_0 BOOT_MODE_1 GND_1 VDD_SNVS
component class 09_Power: 1V4 1V35 \ B1 B2 C120 C121 C122 C123 C124 C125 C126 C127 C128 C129 C130 C131 C132 C133 C134 C135 C136 C137 C138 C139 C140 C141 C142 C144 C145 C146 C147 C148 C149 C150 C159 C160 C161 C245 D18 D20 FB6 L3 L4 L5 L6 lll R142 R143 R144 R145 R146 R147 R148 R149 R150 R151 R152 R153 R154 R155 R156 R157 R158 R159 R160 R161 R162 R163 R164 R165 R166 R167 R168 R169 RESET U11 U12 U13 U14 U17
component class 08_Debug: C356 D8 D9 D10 D11 D12 D13 D14 D15 D16 D17 I2C_1 I2C_2 J8 JTAG R131 R132 R133 R134 R135 R136 R137 R138 R139 R140 R141 SPI UART
component class 07_Display_LCD: C116 C117 FB4 LCD_RGB Q1 R5 R6 R8 R9 R10 R11 R12 R13 R14 R15 R16 R17 R18 R19 R20 R21 R22 R23 R24 R25 R26 R27 R28 R29 R101 R102 R103 R104 R105 R106 R107 R108 R109 R110 R111 R112 R113 R114 R115 R116 R117 R118 R119 R120 R121 R122 R123 R124 R125 R126 R127 R128 R129 R130 R200
component class 06_CAN_RS485: C104 C105 C106 C107 C108 C109 C110 C111 C112 C113 C114 C115 CAN_1 CAN_2 D5 D6 D7 L1 L2 R91 R92 R93 R94 R95 R96 R97 R98 R99 R100 RS-485 U8 U9 U10
component class 05_USB: C100 C101 C102 C103 D3 D4 DEVICE_1 DEVICE_2 F1 F2 R89 R90 U6 U7
component class 04_Ethernet: C83 C87 C88 C90 C91 C92 C93 C94 C95 C96 C97 C98 C99 D1 D2 ETHENET FB3 R70 R71 R72 R73 R74 R75 R76 R77 R78 R79 R80 R81 R82 R83 R84 R85 R86 R87 R88 U5 Y2
component class 03_Boot_Memory: \ C50 C51 C52 C53 C54 C55 C56 C57 C58 C59 C60 C61 C62 C63 C64 C65 C66 C67 C68 C69 C70 C71 C72 C73 C74 C75 C76 C77 C78 C79 C80 C81 C82 EMMC FB1 FB2 QSPI R48 R49 R50 R51 R52 R53 R54 R55 R56 R57 R58 R59 R60 R61 R62 R63 R64 R65 R66 R67 R68 R69
component class 02_DDR3L: C46 C47 C48 C49 DRAM R41 R42 R43 R44 R45 R46 R47 SDCLK0_N SDCLK0_P TP33 TP34
component class 01_CPU_Core: C1 C2 C3 C4 C5 C6 C7 C8 C9 C10 C11 C12 C13 C14 C15 C16 C17 C18 C19 C20 C21 C22 C23 C24 C25 C26 C27 C28 C29 C30 C31 C32 C33 C34 C35 C36 C37 C38 C39 C40 C41 C42 C43 C44 C45 ON/OFF R1 R2 R3 R4 R7 R40 U1 Y1
differential pair USB2: +USB2_P -USB2_N
differential pair USB1: +USB1_P -USB1_N
differential pair SDCLK0: +SDCLK0_P -SDCLK0_N
differential pair DRAM_SDQ0: +DRAM_SDQ0_P -DRAM_SDQ0_N
differential pair DRAM_SDQS1: +DRAM_SDQS1_P -DRAM_SDQS1_N
differential pair TD: +TD_P -TD_N
differential pair RD: +RD_P -RD_N

## Components (designator, comment, footprint, x,y, rotation, side; value= is the part's Value field where it differs from the comment)
1V4 "1V4_SOC_IN" FP-HSMC-C280-MFG 177.68,2403 r180 top (schematic designator D19)
1V35 "1V35_DRAM" FP-HSMG-C150-MFG 122,2899 r270 top (schematic designator D21)
"12V / 28V" "PJ-102AH" CUI_PJ-102AH 320.32,3330 r180 top (schematic designator J13)
B1 "TPS62822DLCR" SON50P150X200X100-8N 309.42,2378.53 r0 top
B2 "TPS62822DLCR" SON50P150X200X100-8N 257.42,2762.84 r0 top
BOOT_MODE_0 "TSW-103-07-G-S" SMTC-TSW-103-07-X-S 1958.86,2618.17 r180 top (schematic designator P2)
BOOT_MODE_1 "TSW-103-07-G-S" SMTC-TSW-103-07-X-S 2319.86,2619.17 r180 top (schematic designator P3)
C1 "10uF" FP-CC0603-DC-IPC_C 3206,2724.66 r270 top
C2 "220nF" FP-CC0603-DA-MFG 3261.36,2592.79 r90 top value="220 nF"
C3 "0.1 uF" CAPC1608X90X35ML10T15 2771,2207 r0 top
C4 "220nF" FP-CC0603-DA-MFG 2974,2099.47 r270 top value="220 nF"
C5 "10uF" FP-CC0603-DC-IPC_C 3038,2100.34 r270 top
C6 "10uF" FP-CC0603-DC-IPC_C 3916.24,2585.65 r90 top
C7 "10uF" FP-CC0603-DC-IPC_C 2888,2448.66 r270 top
C8 "220nF" FP-CC0603-DA-MFG 2823,2442 r270 top value="220 nF"
C9 "220nF" FP-CC0603-DA-MFG 2684,2563 r90 top value="220 nF"
C10 "220nF" FP-CC0603-DA-MFG 2822,2563.53 r90 top value="220 nF"
C11 "220nF" FP-CC0603-DA-MFG 2753,2563.47 r90 top value="220 nF"
C12 "220nF" FP-CC0603-DA-MFG 2680,2442.47 r270 top value="220 nF"
C13 "220nF" FP-CC0603-DA-MFG 2750,2442 r270 top value="220 nF"
C14 "220nF" FP-CC0603-DA-MFG 3035,2333 r90 top value="220 nF"
C15 "220nF" FP-CC0603-DA-MFG 3332.24,2592.98 r90 top value="220 nF"
C16 "220nF" FP-CC0603-DA-MFG 3776.24,2589.51 r90 top value="220 nF"
C17 "220nF" FP-CC0603-DA-MFG 3478.24,2592.46 r90 top value="220 nF"
C18 "22uF" FP-CC0603-DC-MFG 3607.59,1474.87 r0 top
C19 "220nF" FP-CC0603-DA-MFG 3605.59,1623.87 r0 top value="220 nF"
C20 "220nF" FP-CC0603-DA-MFG 3484.06,1473.87 r180 top value="220 nF"
C21 "220nF" FP-CC0603-DA-MFG 3603.59,1550.87 r0 top value="220 nF"
C22 "220nF" FP-CC0603-DA-MFG 3552.24,2590.51 r90 top value="220 nF"
C23 "220nF" FP-CC0603-DA-MFG 3700.24,2590.51 r90 top value="220 nF"
C24 "22uF" FP-CC0603-DC-MFG 3360.59,1475.87 r180 top
C25 "220nF" FP-CC0603-DA-MFG 3363.31,1553 r180 top value="220 nF"
C26 "220nF" FP-CC0603-DA-MFG 3364.31,1627 r180 top value="220 nF"
C27 "220nF" FP-CC0603-DA-MFG 3404.24,2593.51 r90 top value="220 nF"
C28 "10uF" FP-CC0603-DC-IPC_C 2788,2074 r180 top
C29 "10uF" FP-CC0603-DC-IPC_C 2787.66,2132 r180 top
C30 "220nF" FP-CC0603-DA-MFG 3849.24,2589.51 r270 top value="220 nF"
C31 "220nF" FP-CC0603-DA-MFG 3626.24,2590.51 r270 top value="220 nF"
C32 "22uF" FP-CC0603-DC-MFG 3228.66,1558.02 r180 top
C33 "220nF" FP-CC0603-DA-MFG 3229.76,1478.02 r180 top value="220 nF"
C34 "220nF" FP-CC0603-DA-MFG 3229.57,1716.47 r180 top value="220 nF"
C35 "220nF" FP-CC0603-DA-MFG 3229.57,1636.47 r180 top value="220 nF"
C36 "220nF" FP-CC0603-DA-MFG 3826.47,2686 r180 top value="220 nF"
C37 "4.7uF" FP-CC0603-DA-MFG 3368,2698 r0 top value="4.7 uF"
C38 "220nF" FP-CC0603-DA-MFG 3366.53,2770 r0 top value="220 nF"
C39 "220nF" FP-CC0603-DA-MFG 3273,2718.47 r270 top value="220 nF"
C40 "100 nF" FP-CC0603-DA-MFG 3034,2216.53 r270 top
C41 "10uF" FP-CC0603-DC-IPC_C 2967,2216 r270 top
C42 "10uF" FP-CC0603-DC-IPC_C 3483.93,1555.87 r180 top
C43 "220nF" FP-CC0603-DA-MFG 3481.59,1627.87 r180 top value="220 nF"
C44 "100 pF" CAPC1608X90X40ML10T20 2689,3157.43 r90 top
C45 "220nF" FP-CC0603-DA-MFG 2891,2563 r90 top value="220 nF"
C46 "2.2 pF" FP-C0603C-CF-MFG 4230.74,2628.26 r180 top
C47 "2.2 pF" FP-C0603C-CF-MFG 4230.74,2570.26 r180 top
C48 "2.2 pF" FP-C0603C-CF-MFG 4342.86,2568.98 r0 top
C49 "2.2 pF" FP-C0603C-CF-MFG 4342.61,2626.98 r0 top
C50 "220nF" FP-CC0603-DA-MFG 5295.53,2241 r180 top value="220 nF"
C51 "18 pF" CAPC1608X90X40NL10T20 5127,2022.61 r90 top
C52 "18 pF" CAPC1608X90X40NL10T20 5361,2030 r270 top
C53 "100 nF" FP-CC0603-DA-MFG 2576.47,2564 r180 top
C54 "100 nF" FP-CC0603-DA-MFG 1733.8,2009.43 r270 top
C55 "100 nF" FP-CC0603-DA-MFG 1810.8,2009.38 r270 top
C56 "4.7uF" FP-CC0603-DA-MFG 1725.8,2135.91 r90 top value="4.7 uF"
C57 "100 nF" FP-CC0603-DA-MFG 1969.68,2485 r180 top
C58 "4.7uF" FP-CC0603-DA-MFG 1844.68,2493 r180 top value="4.7 uF"
C59 "100 nF" FP-CC0603-DA-MFG 1969.47,2411 r180 top
C60 "2.2 uF" FP-CC0603-DA-MFG 2685,1691 r270 top
C61 "22 uF" FP-CC0603-DC-MFG 1801.8,2135.91 r270 top
C62 "22 uF" FP-CC0603-DC-MFG 2041,2135.53 r270 top
C63 "100 nF" FP-CC0603-DA-MFG 1966.07,2008.74 r270 top
C64 "100 nF" FP-CC0603-DA-MFG 2043.07,2011.21 r270 top
C65 "100 nF" FP-CC0603-DA-MFG 1963.12,2133.23 r90 top
C66 "100 nF" FP-CC0603-DA-MFG 1965.17,1888.66 r90 top
C67 "100 nF" FP-CC0603-DA-MFG 2042.17,1890.19 r90 top
C68 "100 nF" FP-CC0603-DA-MFG 1889.12,2009.7 r270 top
C69 "100 nF" FP-CC0603-DA-MFG 1889.12,1890.17 r90 top
C70 "22 uF" FP-CC0603-DC-MFG 1884.12,2134.23 r270 top
C71 "22 uF" FP-CC0603-DC-MFG 2215,2491.8 r0 top
C72 "22 uF" FP-CC0603-DC-MFG 2459.68,2410 r0 top
C73 "100 nF" FP-CC0603-DA-MFG 2089.53,2491.8 r0 top
C74 "100 nF" FP-CC0603-DA-MFG 1848.47,2412 r180 top
C75 "100 nF" FP-CC0603-DA-MFG 2089.21,2410 r0 top
C76 "100 nF" FP-CC0603-DA-MFG 2460,2491.8 r180 top
C77 "100 nF" FP-CC0603-DA-MFG 2582,2410 r0 top
C78 "100 nF" FP-CC0603-DA-MFG 2339.53,2491.8 r0 top
C79 "100 nF" FP-CC0603-DA-MFG 2339.21,2410 r0 top
C80 "22 uF" FP-CC0603-DC-MFG 2214.21,2410 r0 top
C81 "100 nF" FP-CC0603-DA-MFG 4546,1495.47 r270 top
C82 "4.7uF" FP-CC0603-DA-MFG 4547,1612.53 r90 top value="4.7 uF"
C83 "100 nF" FP-CC0603-DA-MFG 2416,935 r180 top
C87 "100 nF" FP-CC0603-DA-MFG 2364,742.53 r90 top
C88 "4.7 nF" FP-C1210C472KGRAC7800-MFG 2703,740 r0 top
C90 "100 nF" FP-CC0603-DA-MFG 2433,743 r270 top
C91 "100 pF" CAPC1608X90X40ML10T20 2724,1325 r180 top
C92 "100 nF" FP-CC0603-DA-MFG 2227,743 r270 top
C93 "100 nF" FP-CC0603-DA-MFG 2295,742.53 r270 top
C94 "100 nF" FP-CC0603-DA-MFG 2493,1079 r270 top
C95 "100 nF" FP-CC0603-DA-MFG 2563,1179.53 r90 top
C96 "10uF" FP-CC0603-DC-IPC_C 2632,1173.34 r90 top
C97 "100 nF" FP-CC0603-DA-MFG 2089,907 r270 top
C98 "100 nF" FP-CC0603-DA-MFG 2722,1246 r180 top
C99 "100 nF" FP-CC0603-DA-MFG 2503,744 r270 top
C100 "100 nF" FP-CC0603-DA-MFG 1599,423 r180 top
C101 "1uF" FP-CC0603-DA-MFG 1551.18,531.5 r270 top value="1 uF"
C102 "100 nF" FP-CC0603-DA-MFG 802,412 r180 top
C103 "1uF" FP-CC0603-DA-MFG 754,514.53 r270 top value="1 uF"
C104 "47 pF" CAPC1608X90 348.46,725 r0 top
C105 "4.7 nF" FP-CC0603-DA-MFG 470,875 r0 top
C106 "100 nF" FP-CC0603-DA-MFG 735.47,955 r0 top
C107 "47 pF" CAPC1608X90 344.65,958.78 r180 top
C108 "100 nF" FP-CC0603-DA-MFG 949,959 r0 top
C109 "47 pF" CAPC1608X90 335,1205 r0 top
C110 "4.7 nF" FP-CC0603-DA-MFG 470,1195 r0 top
C111 "100 nF" FP-CC0603-DA-MFG 829,1420 r180 top
C112 "47 pF" CAPC1608X90 335,1440 r180 top
C113 "100 nF" FP-CC0603-DA-MFG 1082.68,1295.28 r180 top
C114 "10 uF" FP-GRM188-0_2-IPC_B 629,1632.58 r90 top
C115 "100 nF" FP-CC0603-DA-MFG 544,1637.53 r90 top
C116 "100 nF" FP-CC0603-DA-MFG 5648,1442.53 r270 top
C117 "100 nF" FP-CC0603-DA-MFG 5512.47,625 r0 top
C120 "10 nF" FP-CC0603-DA-MFG 1270,3074 r180 top
C121 "10 nF" FP-CC0603-DA-MFG 975.47,2884 r180 top
C122 "10 uF" FP-GRM188-0_2-IPC_B 435,2202 r270 top
C123 "10 uF" FP-GRM188-0_2-IPC_B 508,2262.58 r90 top
C124 "10 uF" FP-GRM188-0_2-IPC_B 857,3729 r270 top
C125 "120 pF" CAPC1608X90X35NL10T15 409.43,2298 r0 top
C126 "100 nF" FP-CC0603-DA-MFG 970,3184 r0 top
C127 "4.7 uF" FP-0603-L_1_6_0_2-W_0_8_0-IPC_B 287.37,2473 r180 top
C128 "22 uF" CAPC3216X110N 1130,2874 r0 top
C129 "0.1 uF" CAPC1608X90X35ML10T15 975.54,3799 r0 top
C130 "47uF" FP-GRM188-0_2-IPC_B 1444,3497.58 r270 top
C131 "47uF" FP-GRM188-0_2-IPC_B 1408.58,3396 r180 top
C132 "10 uF" FP-GRM188-0_2-IPC_B 439,2826 r270 top
C133 "10 uF" FP-GRM188-0_2-IPC_B 366,2825 r270 top
C134 "10nF" FP-CC0603-DA-MFG 870,3034 r270 top value="10 nF"
C135 "47pF" CAPC1608X90 756.89,3003.57 r180 top
C136 "47pF" CAPC1608X90 756.89,3072.46 r180 top
C137 "120 pF" CAPC1608X90X35NL10T15 352,2596 r270 top
C138 "4.7 uF" FP-0603-L_1_6_0_2-W_0_8_0-IPC_B 264,2871 r180 top
C139 "10nF" FP-CC0603-DA-MFG 972.47,3474 r180 top value="10 nF"
C140 "47pF" CAPC1608X90 1312,3589 r0 top
C141 "1000 pF" CAPC1608X90X35NL10T15 1298.57,3654 r180 top
C142 "1 uF" FP-CC0603-DA-MFG 715,2512 r270 top
C144 "0.1 uF" CAPC1608X90X35ML10T15 2145,3676 r180 top
C145 "100 nF" FP-CC0603-DA-MFG 2263,3406 r270 top
C146 "10 nF" FP-CC0603-DA-MFG 2263,3524 r90 top
C147 "100 nF" FP-CC0603-DA-MFG 2505,3403.47 r270 top
C148 "100 nF" FP-CC0603-DA-MFG 588,2643 r270 top
C149 "4.7uF" FP-CC0603-DA-MFG 789,2650 r270 top value="4.7 uF"
C150 "100 nF" FP-CC0603-DA-MFG 449,2644 r90 top
C151 "100 nF" FP-CC0603-DA-MFG 3446,121.53 r90 bottom
C152 "10 uF" FP-GRM188-0_2-IPC_B 3686,122 r90 bottom
C153 "10 uF" FP-GRM188-0_2-IPC_B 3526,122 r90 bottom
C154 "100 nF" FP-CC0603-DA-MFG 3606,122 r90 bottom
C155 "100 nF" FP-CC0603-DA-MFG 3455.28,352 r270 top
C159 "100 nF" FP-CC0603-DA-MFG 4872,622 r0 top
C160 "100 nF" FP-CC0603-DA-MFG 4575.69,470 r0 top
C161 "1uF" FP-CC0603-DA-MFG 4575.21,541 r180 top value="1 uF"
C162 "2.4 pF" CAPC1005X55N 5215.5,264.83 r180 top
C163 "3.0 pF" CAPC1005X55X25ML05T10 5396,265 r180 top
C164 "100 nF" FP-CC0603-DA-MFG 5018,609 r180 top
C165 "22 pF" CAPC1608X90X40NL10T20 5102,88 r270 top
C166 "22 pF" CAPC1608X90X40NL10T20 4894,126.61 r90 top
C167 "100 nF" FP-CC0603-DA-MFG 4479,493 r90 top
C168 "100 nF" FP-CC0603-DA-MFG 5233,204 r180 top
C169 "100 nF" FP-CC0603-DA-MFG 4873,475 r0 top
C170 "100 nF" FP-CC0603-DA-MFG 4873,553 r0 top
C245 "1 uF" FP-CC0603-DA-MFG 551,2404 r0 top
C356 "100 nF" FP-CC0603-DA-MFG 3766,122 r90 bottom
CAN_1 "TB CAN_1" TE_282834-4 128.74,835.35 r90 top (schematic designator J4)
CAN_2 "TB CAN_2" TE_282834-4 118.74,1358.27 r90 top (schematic designator J5)
CSI_FPC "54548-2471" MOLX-54548-2471 3523.64,189.6 r0 top (schematic designator J14)
D1 "TPD4E02B04DQAR" FP-DQA0010A-MFG 1888.44,742.37 r180 top
D2 "TVS" FP-SMBJ-CA-MFG 2710,472.05 r90 top
D3 "TVS" FP-SOD323-CA-MFG 1333,512 r0 top
D4 "TVS" FP-SOD323-CA-MFG 544,494 r0 top
D5 "PESD1CAN" SOT23-3 344.65,840.67 r90 top
D6 "PESD1CAN" SOT23-3 330,1325 r90 top
D7 "PESD1CAN" SOT23-3 318,1806 r90 top
D8 "TVS" WE-TVSP_DO-214AA_Bidirectional -46639.38,53006.92 r90 top
D9 "TVS" WE-TVSP_DO-214AA_Bidirectional -46452.39,53006.92 r90 top
D10 "TVS" WE-TVSP_DO-214AA_Bidirectional -45092.29,53007.3 r90 top
D11 "TVS" WE-TVSP_DO-214AA_Bidirectional -44904.3,53006.3 r90 top
D12 "TVS" WE-TVSP_DO-214AA_Bidirectional -46260.52,53010.92 r90 top
D13 "TVS" WE-TVSP_DO-214AA_Bidirectional -46072.53,53009.92 r90 top
D14 "TVS" WE-TVSP_DO-214AA_Bidirectional -45843.3,53008.92 r90 top
D15 "TVS" WE-TVSP_DO-214AA_Bidirectional -45656.29,53008.92 r90 top
D16 "TVS" WE-TVSP_DO-214AA_Bidirectional -45469.28,53008.92 r90 top
D17 "TVS" WE-TVSP_DO-214AA_Bidirectional -45282.28,53008.92 r90 top
D18 "SS34-E3/9AT" FP-SMC-MFG 1475,2994 r270 top
D20 "B340A-13-F" FP-SMA-MFG 1212,3839 r0 top
D22 "TVS" WE-TVSP_DO-214AA_Bidirectional -46029,50173.42 r90 top
D23 "TVS" WE-TVSP_DO-214AA_Bidirectional -45850,50175.42 r90 top
D24 "TVS" WE-TVSP_DO-214AA_Bidirectional -47103,50174.58 r90 top
D25 "TVS" WE-TVSP_DO-214AA_Bidirectional -46933,50174.58 r90 top
DEVICE_1 "292303-1" TE-292303-1_V 1421.32,273.58 r0 top (schematic designator J2)
DEVICE_2 "292303-1" TE-292303-1_V 689.08,269.13 r0 top (schematic designator J3)
DRAM "MT41K256M16TW-107:P" FP-TW-IPC_C 4297.38,2243.48 r0 top (schematic designator U2)
EMMC "S40FC004C1B1I00000" BGA153N50P14X14_1150X1300X80 2352.39,2072.12 r180 top (schematic designator U3)
ETHENET "WE-RJ45_7498010210A" J00-00XXNL 2209.5,244.74 r180 top (schematic designator T1)
F1 "Fuse" FP-1206L050YR-MFG 1444,425 r0 top
F2 "Fuse" FP-1206L050YR-MFG 649.88,409 r0 top
FB1 "FB" FP-BLM21-0_2-t0_85-e0_5-IPC_C 1791.8,1872.91 r0 top
FB2 "FB" FP-BLM21-0_2-t0_85-e0_5-IPC_C 1960.57,2337 r180 top
FB4 "BLM18PG121SN1D" FP-BLM18-0_15-t0_8-IPC_A 5387,607 r270 top
FB6 "FB" FP-BLM18-0_15-t0_8-IPC_A 4717.45,482 r180 top locked
GND "10 kΩ" RESC1608X55X25ML10T15 2149.86,2724.17 r180 top (schematic designator R173)
GND "10 kΩ" RESC1608X55X25ML10T15 1798.86,2718.17 r180 top (schematic designator R171)
GND_1 "" KEYSTONE_5277 5811,432 r180 top (schematic designator GND_7)
I2C_1 "TB I2C1" TE_282834-4 3839.9,3832.06 r180 top (schematic designator J12)
I2C_2 "TB I2C2" TE_282834-4 3368,3834 r180 top (schematic designator J10)
J8 "Global Header" 61302011121 4187,3460 r180 top
J15 "1909763-1" TE_1909763-1 5387,147 r180 top
JTAG "61202021621" 61202021621 5780.09,2914.3 r270 top (schematic designator P1)
L1 "B82789C0513N002" FP-B82789C0513N002-0 659.72,825.28 r180 top
L2 "B82789C0513N002" FP-B82789C0513N002-0 632,1292 r270 top
L3 "470 nH" FP-XFL4015-MFG 234,2223 r270 top
L4 "7447785004" WE-PD_6033R 1793,3036 r270 top
L5 "6.8 uH" IND_SPM10054T_TDK 1787,3648.88 r270 top
L6 "470 nH" FP-XFL4015-MFG 169,2615.35 r270 top
L7 "2.2 nH" FP-LQW15AN_80-MFG 5293,263 r0 top
LCD_RGB "FH12-40S-0.5SH(55)" FP-FH12-40S-0_5SH_55-MFG 5857.83,1030.47 r90 top (schematic designator J7)
MCIMX6Y2DVM08AB "Component_3" LFBGA289_SOT1534-2_NXP 3602.24,2206.49 r180 top locked (schematic designator U79)
ON/OFF "" PTS645SM43SMTR92LFS_MFG 2520,3107 r270 top (schematic designator SW1)
Q1 "N-MOSFET" FP-PG-SOT23-3-MFG 5613,499 r90 top
QSPI "W25Q128JVSIQ" SOIC127P790X216-8N#1 4394.68,1581.59 r90 top (schematic designator U4)
R1 "4.7 kΩ" RESC1608X55X25LL10T15 3733,3181 r180 top
R2 "4.7 kΩ" RESC1608X55X25LL10T15 3928,3180 r180 top
R3 "4.7 kΩ" RESC1608X55X25LL10T15 3541,3175 r0 top
R4 "4.7 kΩ" RESC1608X55X25LL10T15 3362,3177 r0 top
R5 "10 kΩ" RESC1608X55X25ML10T15 3994.24,1928.98 r180 bottom
R6 "10 kΩ" RESC1608X55X25ML10T15 3994,1867 r180 bottom
R7 "4.7K" RESC1608X55X25LL10T15 3240.41,2389 r0 top
R8 "10 kΩ" RESC1608X55X25ML10T15 3721.24,1819.98 r90 bottom
R9 "10 kΩ" RESC1608X55X25ML10T15 3238,2319 r0 bottom
R10 "10 kΩ" RESC1608X55X25ML10T15 3994,2050 r180 bottom
R11 "10 kΩ" RESC1608X55X25ML10T15 3239.24,2138.98 r0 bottom
R12 "10 kΩ" RESC1608X55X25ML10T15 3662.24,1820.51 r90 bottom
R13 "10 kΩ" RESC1608X55X25ML10T15 3994,2109 r180 bottom
R14 "10 kΩ" RESC1608X55X25ML10T15 3239.24,2079.98 r0 bottom
R15 "10 kΩ" RESC1608X55X25ML10T15 3602.24,1819.51 r90 bottom
R16 "10 kΩ" RESC1608X55X25ML10T15 3238.47,2261 r0 bottom
R17 "10 kΩ" RESC1608X55X25ML10T15 3993.53,2167 r180 bottom
R18 "10 kΩ" RESC1608X55X25ML10T15 3901.24,1819.98 r90 bottom
R19 "10 kΩ" RESC1608X55X25ML10T15 3239.24,2021.98 r0 bottom
R20 "10 kΩ" RESC1608X55X25ML10T15 3543.24,1819.51 r90 bottom
R21 "10 kΩ" RESC1608X55X25ML10T15 3994,1991 r180 bottom
R22 "10 kΩ" RESC1608X55X25ML10T15 3840.24,1819.98 r90 bottom
R23 "10 kΩ" RESC1608X55X25ML10T15 3239.24,1961.98 r0 bottom
R24 "10 kΩ" RESC1608X55X25ML10T15 3483.24,1819.98 r90 bottom
R25 "10 kΩ" RESC1608X55X25ML10T15 3239.53,2200 r0 bottom
R26 "10 kΩ" RESC1608X55X25ML10T15 3781.24,1819.98 r90 bottom
R27 "10 kΩ" RESC1608X55X25ML10T15 3239.71,1901.98 r0 bottom
R28 "10 kΩ" RESC1608X55X25ML10T15 3425.24,1819.98 r90 bottom
R29 "10 kΩ" RESC1608X55X25ML10T15 3366.24,1818.98 r90 bottom
R40 "240 Ω , 1%" RESC0603(1608)_L 3916,2687.44 r90 top value="240.00 Ohm"
R41 "22 Ω" FP-RC0603-0_55-IPC_C 4497.36,2324.26 r270 top
R42 "22 Ω" FP-RC0603-0_55-IPC_C 4520,2402.26 r180 top
R43 "240 Ω , 1%" RESC0603(1608)_L 4520.36,2169.26 r0 top value="240.00 Ohm"
R44 "10 kΩ ±5%" RESC1608X55X25ML10T15 4522.36,2234.26 r0 top
R45 "10 kΩ ±5%" RESC1608X55X25ML10T15 4501.36,2008.26 r270 top
R46 "10 kΩ ±5%" RESC1608X55X25ML10T15 4523.36,2113.26 r180 top
R47 "470 Ω" RESC1608X55X25LL10T15 4553.36,2323.26 r90 top
R48 "4.7 kΩ" RESC1608X55X25LL10T15 5349.59,1951 r0 top
R49 "10 kΩ" RESC1608X55X25ML10T15 5245,1919 r270 top
R50 "22 Ω" FP-RC0603-0_55-IPC_C 5349,1899 r0 top
R51 "10 Ω" RESC2013X60X35ML10T20 5244.63,2025 r0 top
R52 "10 kΩ" RESC1608X55X25ML10T15 5279,2140 r270 top
R53 "10 kΩ" RESC1608X55X25ML10T15 2577.47,2489 r0 top
R54 "4.7 kΩ" RESC1608X55X25LL10T15 1981,1688 r270 top
R55 "10 kΩ" RESC1608X55X25ML10T15 2047.12,1692.23 r90 top
R56 "10 kΩ" RESC1608X55X25ML10T15 2127.12,1692.7 r90 top
R57 "10 kΩ" RESC1608X55X25ML10T15 2367.12,1692.23 r90 top
R58 "10 kΩ" RESC1608X55X25ML10T15 2527.12,1692.7 r90 top
R59 "10 kΩ" RESC1608X55X25ML10T15 2607.12,1692.23 r90 top
R60 "10 kΩ" RESC1608X55X25ML10T15 2207.12,1692.23 r90 top
R61 "10 kΩ" RESC1608X55X25ML10T15 2287.12,1692.23 r90 top
R62 "10 kΩ" RESC1608X55X25ML10T15 2447.12,1693.17 r90 top
R63 "22 Ω" FP-RC0603-0_55-IPC_C 2039,2246.64 r270 top
R64 "22 Ω" FP-RC0603-0_55-IPC_C 2026,1800 r0 top
R65 "47 k" RESC1608X55X25LL10T15 1964,2235.41 r90 top
R66 "10 kΩ" RESC1608X55X25ML10T15 4336.53,1336 r180 top
R67 "10 kΩ" RESC1608X55X25ML10T15 4344.21,1809.36 r0 top
R68 "10 kΩ" RESC1608X55X25ML10T15 4458.53,1336 r180 top
R69 "22 Ω" FP-RC0603-0_55-IPC_C 4254,1574 r270 top
R70 "22 Ω" FP-RC0603-0_55-IPC_C 2320,922 r270 top
R71 "2.2 kΩ" RESC1608X55X25LL10T15 1987,751 r270 top
R72 "330 Ω" RESC1608X55X25ML10T15 2062,748 r90 top
R73 "1 MΩ" FP-CRCW1206-e3-MFG 2703,631 r0 top
R74 "330 Ω" RESC1608X55X25ML10T15 2142,747.53 r90 top
R75 "2.2 kΩ" RESC1608X55X25LL10T15 1829,1431 r180 top
R76 "2.2 kΩ" RESC1608X55X25LL10T15 1829,1384 r180 top
R77 "10 kΩ" RESC1608X55X25ML10T15 2170,909 r270 top
R78 "2.2 kΩ" RESC1608X55X25LL10T15 2282,1506 r270 top
R79 "49.9Ω" RESC1608X55X25ML10T15 1836.86,1232.17 r0 top
R80 "49.9Ω" RESC1608X55X25ML10T15 1837.33,1104.17 r0 top
R81 "2.2 kΩ" RESC1608X55X25LL10T15 2229,1507 r270 top
R82 "1.5 kΩ" RESC1608X55X25ML10T15 2252,909.53 r270 top
R83 "49.9Ω" RESC1608X55X25ML10T15 1836.86,1294.17 r180 top
R84 "49.9Ω" RESC1608X55X25ML10T15 1836.86,1168.17 r180 top
R85 "2.2 kΩ" RESC1608X55X25LL10T15 2632,1289 r270 top
R86 "4.87 kΩ" RESC1608X55N#1 2023,903 r270 top
R87 "2.2 kΩ" RESC1608X55X25LL10T15 1920,892 r270 top
R88 "2.2 kΩ" RESC1608X55X25LL10T15 1967,892 r270 top
R89 "1 kΩ" RESC1607X60N 1449,584 r0 top
R90 "1 kΩ" RESC1607X60N 657,571 r0 top
R91 "60 Ω" RESC1608X55X25ML10T15 460,760 r270 top
R92 "60 Ω" RESC1608X55X25ML10T15 480,965 r0 top
R93 "60 Ω" RESC1608X55X25ML10T15 462.28,1282.01 r0 top
R94 "60 Ω" RESC1608X55X25ML10T15 462.28,1360.75 r180 top
R95 "120Ω" RESC1608X55X25ML10T15 430,1810.47 r90 top
R96 "10 kΩ" RESC1608X55X25ML10T15 846.53,1819 r180 top
R97 "10 kΩ" RESC1608X55X25ML10T15 846,1900 r180 top
R98 "20 kΩ" FP-RT0603-MFG 320,1700 r180 top value=20KΩ
R99 "10 kΩ" RESC1608X55X25ML10T15 846.53,1738 r180 top
R100 "20 kΩ" FP-RT0603-MFG 320,1910 r180 top value=20KΩ
R101 "100 Ω" FP-RC0603-0_55-IPC_A 5493,504.48 r270 top
R102 "22 Ω" FP-RC0603-0_55-IPC_C 3841.24,1720.63 r270 bottom
R103 "22 Ω" FP-RC0603-0_55-IPC_C 3137.88,1958.98 r180 bottom
R104 "7.5 Ω" RESC1608X55X25ML10T15 5619,638 r90 top
R105 "22 Ω" FP-RC0603-0_55-IPC_C 3486.24,1717.98 r270 bottom
R106 "22 Ω" FP-RC0603-0_55-IPC_C 3124.36,2190 r180 bottom
R107 "22 Ω" FP-RC0603-0_55-IPC_C 3780.24,1720.98 r270 bottom
R108 "22 Ω" FP-RC0603-0_55-IPC_C 3138.59,1897.98 r180 bottom
R109 "22 Ω" FP-RC0603-0_55-IPC_C 3423.24,1716.98 r270 bottom
R110 "22 Ω" FP-RC0603-0_55-IPC_C 3126.64,2137 r180 bottom
R111 "22 Ω" FP-RC0603-0_55-IPC_C 3664.24,1718.98 r270 bottom
R112 "22 Ω" FP-RC0603-0_55-IPC_C 4091,2168 r180 bottom
R113 "22 Ω" FP-RC0603-0_55-IPC_C 3542.24,1718.98 r270 bottom
R114 "22 Ω" FP-RC0603-0_55-IPC_C 4095.64,1867 r0 bottom
R115 "22 Ω" FP-RC0603-0_55-IPC_C 3722.24,1720.98 r270 bottom
R116 "22 Ω" FP-RC0603-0_55-IPC_C 3124.64,2305 r180 bottom
R117 "22 Ω" FP-RC0603-0_55-IPC_C 4089,2049 r180 bottom
R118 "22 Ω" FP-RC0603-0_55-IPC_C 4090.76,1927.12 r0 bottom
R119 "22 Ω" FP-RC0603-0_55-IPC_C 4093,2108 r180 bottom
R120 "22 Ω" FP-RC0603-0_55-IPC_C 3126.36,2084 r180 bottom
R121 "22 Ω" FP-RC0603-0_55-IPC_C 3739.36,2700.26 r90 top
R122 "22 Ω" FP-RC0603-0_55-IPC_C 3605.24,1718.98 r270 bottom
R123 "22 Ω" FP-RC0603-0_55-IPC_C 3513,2702.64 r90 top
R124 "22 Ω" FP-RC0603-0_55-IPC_C 3586,2701.64 r90 top
R125 "22 Ω" FP-RC0603-0_55-IPC_C 3124.36,2249 r180 bottom
R126 "22 Ω" FP-RC0603-0_55-IPC_C 3662.36,2701.26 r90 top
R127 "22 Ω" FP-RC0603-0_55-IPC_C 3896.24,1719.63 r270 bottom
R128 "22 Ω" FP-RC0603-0_55-IPC_C 3136.59,2019.98 r180 bottom
R129 "22 Ω" FP-RC0603-0_55-IPC_C 4088,1992 r180 bottom
R130 "22 Ω" FP-RC0603-0_55-IPC_C 3363.24,1718.34 r270 bottom
R131 "10 kΩ" RESC1608X55X25ML10T15 5549,3058 r90 top
R132 "10 kΩ" RESC1608X55X25ML10T15 5548,3198 r270 top
R133 "10 kΩ" RESC1608X55X25ML10T15 5550,2590 r90 top
R134 "22 Ω" FP-RC0603-0_55-IPC_C 5552,2840.64 r90 top
R135 "10 kΩ" RESC1608X55X25ML10T15 5550,2726 r90 top
R136 "22 Ω" FP-RC0603-0_55-IPC_C 5084,3178 r0 top
R137 "22 Ω" FP-RC0603-0_55-IPC_C 4880,3179 r0 top
R138 "22 Ω" FP-RC0603-0_55-IPC_C 4716,3181 r0 top
R139 "22 Ω" FP-RC0603-0_55-IPC_C 4530,3181 r0 top
R140 "22 Ω" FP-RC0603-0_55-IPC_C 4344.64,3181 r0 top
R141 "22 Ω" FP-RC0603-0_55-IPC_C 4154.36,3181 r0 top
R142 "86.6 kΩ" 0603 846.54,2944 r180 top
R143 "10 kΩ" FP-RC0603-0_55-MFG 1275,3009 r180 top
R144 "133 kΩ" RESC1608X55N#2 370,2200 r270 top
R145 "100 kΩ" FP-RC0603-0_55-MFG 396,2394.46 r270 top
R146 "100 kΩ" FP-RC0603-0_55-MFG 193,2353 r180 top
R147 "0Ω" FP-RC0603-MFG 1371,3494.54 r270 top
R148 "332 kΩ" RESC1608X55X25ML10T15 837,3619 r180 top
R149 "124 kΩ" RESC1608X55X25NL10T15 291,2595.44 r270 top
R150 "10.2 kΩ" RESC1608X55X25LL10T15 1287,3534 r0 top
R151 "3.24 kΩ" FP-CRCW0603-e3-IPC_A 1114.1,3464 r180 top
R152 "68.1 kΩ" RESC1608X55X25LL10T15 877,3530 r90 top
R153 "100 kΩ" FP-RC0603-0_55-MFG 323,2678 r180 top
R154 "29.4 kΩ" RESC1608X55X25ML10T15 1312,3729 r0 top
R155 "100 kΩ" FP-RC0603-0_55-MFG 136.46,2762 r180 top
R156 "10 kΩ" RESC1608X55X25ML10T15 2548.53,3637 r0 top
R157 "10 kΩ" RESC1608X55X25ML10T15 2145,3594 r180 top
R158 "10 kΩ" RESC1608X55X25ML10T15 2082.68,3236.22 r270 top
R159 "0Ω" FP-RC0603-MFG 2379,3592 r0 top
R160 "68 kΩ" RESC1608X55X25LL10T15 2236.61,3774.59 r90 top
R161 "33 kΩ" RESC1608X55X25LL10T15 2196.61,3852.59 r0 top
R162 "23.2kΩ" RESC1608X55X25LL10T15 2431.61,3869.59 r270 top
R163 "22 kΩ" RESC1608X55X25ML10T15 2536.61,3727.12 r90 top
R164 "10 kΩ" RESC1608X55X25ML10T15 2144.61,3757.59 r0 top
R165 "10 kΩ" RESC1608X55X25ML10T15 2284.61,3894.12 r270 top
R166 "10 kΩ" RESC1608X55X25ML10T15 2367.61,3894.12 r270 top
R167 "10 kΩ" RESC1608X55X25ML10T15 2498,3894.53 r270 top
R168 "1K , 1%" RESC1607X60N 688,2682 r0 top
R169 "1K , 1%" RESC1607X60N 517,2643.94 r90 top
R174 "22 Ω" FP-RC0603-0_55-IPC_C 3285,343.64 r90 top
R175 "22 Ω" FP-RC0603-0_55-IPC_C 3339,343.64 r90 top
R176 "22 Ω" FP-RC0603-0_55-IPC_C 3392,343.64 r90 top
R177 "22 Ω" FP-RC0603-0_55-IPC_C 3519.28,344.17 r90 top
R178 "22 Ω" FP-RC0603-0_55-IPC_C 3573.28,345.53 r90 top
R179 "10 kΩ" RESC1608X55X25ML10T15 4874,427 r0 top
R180 "10 kΩ" RESC1608X55X25ML10T15 4987,505.24 r270 top
R181 "10 kΩ" RESC1608X55X25ML10T15 5234,101 r270 top
R182 "10 kΩ" RESC1608X55X25ML10T15 5112,505.53 r90 top
R183 "10 kΩ" RESC1608X55X25ML10T15 5175,505.53 r90 top
R184 "10 kΩ" RESC1608X55X25ML10T15 5049.06,504.53 r90 top
R185 "12k" RESC1608X55X25NL10T15 5166,87.44 r270 top
R186 "22 Ω" FP-RC0603-0_55-IPC_C 4877,317 r180 top
R200 "22 Ω" FP-RC0603-0_55-IPC_C 3444,2703.64 r90 top
RESET "" PTS645SM43SMTR92LFS_MFG 2248.94,3110.06 r270 top (schematic designator SW2)
RS-485 "TB RS-485" TE_282834-4 108.74,1859.45 r270 top (schematic designator J6)
SD_CARD "1040310811" 104031-0811_MOL 5659,1939 r270 top (schematic designator J1)
SDCLK0_N "" KEYSTONE_5277 4720,2227 r180 top
SDCLK0_P "" KEYSTONE_5277 4714,2390 r180 top
SPI "TB SPI" TE_282834-6 4415,3834 r180 top (schematic designator J11)
U1 "24MHZ" ASVMB_ABR 2929,1905 r90 top
U5 "DP83848IVV/NOPB" PT0048A_N 2256.73,1236.66 r270 top
U6 "TPD2E001DRYR" DRY0006A 1451.32,512.16 r90 top
U7 "TPD2E001DRYR" DRY0006A 655,498 r90 top
U8 "TJA1051T/3,118" NXP-SOIC-8_L 945,820 r180 top
U9 "TJA1051T/3,118" NXP-SOIC-8_L 890.35,1274 r180 top
U10 "MAX3485EESA+T" SOIC127P600X175-8N 623.94,1821.14 r180 top
U11 "TPS5405DR" SOIC127P599X175-8N 1065,3034 r0 top
U12 "TPS54331DR" D0008A_M 1072,3634 r0 top
U13 "TPS386000RGPT" FP-RGP0020A-MFG 2383.08,3722.12 r180 top
U14 "TPS3808G33" DBV6_M 2383.35,3442.81 r270 top
U16 "SPI_Flash" SOIC127P790X216-8N#2 4618,313 r0 top
U17 "TLV70218DBVT" SOT95P280X145-5N 584.41,2509 r0 top
UART "TB UART" TE_282834-4 4998,3828 r180 top (schematic designator J9)
VDD_SNVS "10 kΩ" RESC1608X55X25ML10T15 2279.39,2724.17 r0 top (schematic designator R172)
VDD_SNVS "10 kΩ" RESC1608X55X25ML10T15 1929.33,2718.17 r0 top (schematic designator R170)
WIFI "ESP8266EX" ESFS-QFN-32_L 5059,325.31 r180 top (schematic designator U15)
WIFI_TOUT "" KEYSTONE_5277 5614,339 r180 top (schematic designator WF_TOUT)
Y1 "32.768 kHz" XTAL_ECS-.327-6-34RR-TR 2889.24,2126.98 r270 top
Y2 "ASV-50.000MHZ-EJ-T" ASV-50.000MHZ-EJ-T_ABR 2687,972.74 r270 top
Y3 "26 MHZ" FP-ABM8G-MFG 5001,107 r90 top

## Footprints (in the part's own frame and the unit in brackets; to place one, negate y for a bottom-side part, rotate by r counter-clockwise, add the part's x,y. Pads: shape width x height; smd on the part's side, far side on the other; paste and mask are expansions set on the pad)
0603 [mm]
  rect 1.1x1 smd paste+0 mask+0.102: 1(-0.85,0) 2(0.85,0)
  body extent -0.8,-0.4 0.8,0.4, height 0.55
104031-0811_MOL [mil]
  rect 32x45 smd: 1(122.24,-217.38) 2(78.94,-217.38) 3(35.63,-217.38) 4(-7.68,-217.38) 5(-50.98,-217.38) 6(-94.29,-217.38) 7(-137.6,-217.38) 8(-180.91,-217.38)
  rect 49x41 smd: 9(225.98,24.74) 10(225.98,170.41)
  rect 63x55 smd: 11(219.09,-212.46)
  rect 48x73 smd: 12(-226.57,-203.6)
  rect 77x55 smd: 13(-146.85,208.8) 14(88.19,208.8)
  silkscreen extent -243,-232 243,232, body extent -249,-245 279,310, height 47
61202021621 [mm] "20 pins, straight, gold plating"
  rrect50% 1.6x1.6 hole 1.1: 1(-11.43,-1.27)
  round 1.6 hole 1.1: 2(-11.43,1.27) 3(-8.89,-1.27) 4(-8.89,1.27) 5(-6.35,-1.27) 6(-6.35,1.27) 7(-3.81,-1.27) 8(-3.81,1.27) 9(-1.27,-1.27) 10(-1.27,1.27) 11(1.27,-1.27) 12(1.27,1.27) 13(3.81,-1.27) 14(3.81,1.27) 15(6.35,-1.27) 16(6.35,1.27) 17(8.89,-1.27) 18(8.89,1.27) 19(11.43,-1.27) 20(11.43,1.27)
  silkscreen extent -16.63,-4.5 16.63,4.5, body extent -16.53,-4.42 16.53,4.75, height 9.13
61302011121 [mm]
  round 1.65 hole 1.1: 1(-24.13,0) 2(-21.59,0) 3(-19.05,0) 4(-16.51,0) 5(-13.97,0) 6(-11.43,0) 7(-8.89,0) 8(-6.35,0) 9(-3.81,0) 10(-1.27,0) 11(1.27,0) 12(3.81,0) 13(6.35,0) 14(8.89,0) 15(11.43,0) 16(13.97,0) 17(16.51,0) 18(19.05,0) 19(21.59,0) 20(24.13,0)
  silkscreen extent -25.5,-1.37 25.5,1.37, body extent -25.4,-1.27 25.4,1.27, height 7.27
ASV-50.000MHZ-EJ-T_ABR [mil]
  rect 55x53 smd paste+0 mask+0: 1(-84.5,100) 2(-84.5,-100) 3(84.5,-100) 4(84.5,100)
  silkscreen extent -318,-143 105,143, body extent -100,-138 100,138, height 71
ASVMB_ABR [mil]
  rect 59x53 smd paste+0 mask+0: 1(-83,100) 2(-83,-100) 3(83,-100) 4(83,100)
  rect 138x87 smd paste+0 mask+0: 5(0,0)
  silkscreen extent -318,-145 106,145, body extent -101,-140 101,140, height 35
BGA153N50P14X14_1150X1300X80 [mm]
  round 0.35 smd mask+0.055: A1(-3.25,3.25) A2(-2.75,3.25) A3(-2.25,3.25) A4(-1.75,3.25) A5(-1.25,3.25) A6(-0.75,3.25) A7(-0.25,3.25) A8(0.25,3.25) A9(0.75,3.25) A10(1.25,3.25) A11(1.75,3.25) A12(2.25,3.25) A13(2.75,3.25) A14(3.25,3.25) B1(-3.25,2.75) B2(-2.75,2.75) B3(-2.25,2.75) B4(-1.75,2.75) B5(-1.25,2.75) B6(-0.75,2.75) B7(-0.25,2.75) B8(0.25,2.75) B9(0.75,2.75) B10(1.25,2.75) B11(1.75,2.75) B12(2.25,2.75) B13(2.75,2.75) B14(3.25,2.75) C1(-3.25,2.25) C2(-2.75,2.25) C3(-2.25,2.25) C4(-1.75,2.25) C5(-1.25,2.25) C6(-0.75,2.25) C7(-0.25,2.25) C8(0.25,2.25) C9(0.75,2.25) C10(1.25,2.25) C11(1.75,2.25) C12(2.25,2.25) C13(2.75,2.25) C14(3.25,2.25) D1(-3.25,1.75) D2(-2.75,1.75) D3(-2.25,1.75) D4(-1.75,1.75) D12(2.25,1.75) D13(2.75,1.75) D14(3.25,1.75) E1(-3.25,1.25) E2(-2.75,1.25) E3(-2.25,1.25) E5(-1.25,1.25) E6(-0.75,1.25) E7(-0.25,1.25) E8(0.25,1.25) E9(0.75,1.25) E10(1.25,1.25) E12(2.25,1.25) E13(2.75,1.25) E14(3.25,1.25) F1(-3.25,0.75) F2(-2.75,0.75) F3(-2.25,0.75) F5(-1.25,0.75) F10(1.25,0.75) F12(2.25,0.75) F13(2.75,0.75) F14(3.25,0.75) G1(-3.25,0.25) G2(-2.75,0.25) G3(-2.25,0.25) G5(-1.25,0.25) G10(1.25,0.25) G12(2.25,0.25) G13(2.75,0.25) G14(3.25,0.25) H1(-3.25,-0.25) H2(-2.75,-0.25) H3(-2.25,-0.25) H5(-1.25,-0.25) H10(1.25,-0.25) H12(2.25,-0.25) H13(2.75,-0.25) H14(3.25,-0.25) J1(-3.25,-0.75) J2(-2.75,-0.75) J3(-2.25,-0.75) J5(-1.25,-0.75) J10(1.25,-0.75) J12(2.25,-0.75) J13(2.75,-0.75) J14(3.25,-0.75) K1(-3.25,-1.25) K2(-2.75,-1.25) K3(-2.25,-1.25) K5(-1.25,-1.25) K6(-0.75,-1.25) K7(-0.25,-1.25) K8(0.25,-1.25) K9(0.75,-1.25) K10(1.25,-1.25) K12(2.25,-1.25) K13(2.75,-1.25) K14(3.25,-1.25) L1(-3.25,-1.75) L2(-2.75,-1.75) L3(-2.25,-1.75) L12(2.25,-1.75) L13(2.75,-1.75) L14(3.25,-1.75) M1(-3.25,-2.25) M2(-2.75,-2.25) M3(-2.25,-2.25) M4(-1.75,-2.25) M5(-1.25,-2.25) M6(-0.75,-2.25) M7(-0.25,-2.25) M8(0.25,-2.25) M9(0.75,-2.25) M10(1.25,-2.25) M11(1.75,-2.25) M12(2.25,-2.25) M13(2.75,-2.25) M14(3.25,-2.25) N1(-3.25,-2.75) N2(-2.75,-2.75) N3(-2.25,-2.75) N4(-1.75,-2.75) N5(-1.25,-2.75) N6(-0.75,-2.75) N7(-0.25,-2.75) N8(0.25,-2.75) N9(0.75,-2.75) N10(1.25,-2.75) N11(1.75,-2.75) N12(2.25,-2.75) N13(2.75,-2.75) N14(3.25,-2.75) P1(-3.25,-3.25) P2(-2.75,-3.25) P3(-2.25,-3.25) P4(-1.75,-3.25) P5(-1.25,-3.25) P6(-0.75,-3.25) P7(-0.25,-3.25) P8(0.25,-3.25) P9(0.75,-3.25) P10(1.25,-3.25) P11(1.75,-3.25) P12(2.25,-3.25) P13(2.75,-3.25) P14(3.25,-3.25)
  silkscreen extent -6.4,-6.5 5.75,6.5, body extent -5.75,-6.5 5.75,6.5, height 0.8
CAPC1005X55N [mm]
  rect 0.54x0.6 smd: 1(-0.432,0) 2(0.432,0)
  body extent -0.5,-0.25 0.5,0.25, height 0.55
CAPC1005X55X25ML05T10 [mm] "Chip Capacitor, 2-Leads, Body 1.00x0.50mm, IPC Low Density"
  rect 0.76x0.72 smd: 1(-0.49,0) 2(0.49,0)
  body extent -0.53,-0.28 0.53,0.27, height 0.55
CAPC1608X90 [mm]
  rect 1.1x1 smd: 1(-0.85,0) 2(0.85,0)
  silkscreen extent -0.15,-0.45 0.15,0.45, body extent -0.8,-0.4 0.8,0.4, height 0.9
CAPC1608X90X35ML10T15 [mm] "Chip Capacitor, 2-Leads, Body 1.7x0.9mm, IPC Low Density"
  rect 0.95x1.05 smd: 1(-0.725,0) 2(0.725,0)
  body extent -0.85,-0.45 0.85,0.45, height 0.9
CAPC1608X90X35NL10T15 [mm] "Chip Capacitor, 2-Leads, Body 1.60x0.80mm, IPC Medium Density"
  rect 0.85x0.95 smd: 1(-0.675,0) 2(0.675,0)
  body extent -0.85,-0.45 0.85,0.45, height 0.9
CAPC1608X90X40ML10T20 [mm] "Chip Capacitor, 2-Leads, Body 1.7x0.9mm, IPC Low Density"
  rect 1.05x1.05 smd: 1(-0.675,0) 2(0.675,0)
  body extent -0.85,-0.45 0.85,0.45, height 0.9
CAPC1608X90X40NL10T20 [mm] "Chip Capacitor, 2-Leads, Body 1.7x0.9mm, IPC Medium Density"
  rect 0.95x0.95 smd: 1(-0.625,0) 2(0.625,0)
  body extent -0.85,-0.45 0.85,0.45, height 0.9
CAPC3216X110N [mm]
  rect 1.16x1.82 smd: 1(-1.475,0) 2(1.475,0)
  silkscreen extent -0.57,-0.9 0.57,0.9, body extent -1.6,-0.8 1.6,0.8, height 1.8
CUI_PJ-102AH [mm]
  oval 1.508x3.016 hole 1 square: 1(-6.5,0) 2(-0.5,0)
  oval 3.016x1.508 hole 1 square: 3(-3.5,4.7)
  silkscreen extent -8.3,-4.5 7.2,4.5, body extent -7.03,-4.7 7.37,4.7, height 12.63
D0008A_M [mm] "SOIC, 8-Leads, Body 5x4mm, Pitch 1.27mm, IPC Low Density"
  rrect15% 1.65x0.65 smd: 1(-2.825,1.905) 2(-2.825,0.635) 3(-2.825,-0.635) 4(-2.825,-1.905) 5(2.825,-1.905) 6(2.825,-0.635) 7(2.825,0.635) 8(2.825,1.905)
  silkscreen extent -2.95,-2.5 1.6,2.9, body extent -3,-2.45 3,2.45, height 1.63
DBV6_M [mm] "SOT23, 6-Leads, Body 2.9x1.6mm, Pitch 0.95mm, Lead Span 2.8mm, IPC Low Density"
  rect 1.3x0.7 smd: 1(-1.2,0.95) 2(-1.2,0) 3(-1.2,-0.95) 4(1.2,-0.95) 5(1.2,0) 6(1.2,0.95)
  silkscreen extent -1.32,-1.55 0.15,1.98, body extent -0.87,-1.52 0.87,1.53, height 1.45
DRY0006A [mm] "SON, 6-Leads, Body 1.45x1mm, Pitch 0.5mm"
  rrect33% 0.52x0.3 smd: 1(-0.37,0.5)
  rrect33% 0.49x0.3 smd: 2(-0.385,0) 3(-0.385,-0.5) 4(0.385,-0.5) 5(0.385,0) 6(0.385,0.5)
  silkscreen extent -1.08,0.45 -0.98,0.55, body extent -0.5,-0.72 0.5,0.72, height 0.6
ESFS-QFN-32_L [mm] "QFN, 32-Leads, Body 5.05x5.05mm, Pitch 0.50mm, Thermal Pad 3.70x3.70mm, IPC High Density"
  oval 0.7x0.25 smd: 1(-2.375,1.75) 2(-2.375,1.25) 3(-2.375,0.75) 4(-2.375,0.25) 5(-2.375,-0.25) 6(-2.375,-0.75) 7(-2.375,-1.25) 8(-2.375,-1.75) 17(2.375,-1.75) 18(2.375,-1.25) 19(2.375,-0.75) 20(2.375,-0.25) 21(2.375,0.25) 22(2.375,0.75) 23(2.375,1.25) 24(2.375,1.75)
  oval 0.25x0.7 smd: 9(-1.75,-2.375) 10(-1.25,-2.375) 11(-0.75,-2.375) 12(-0.25,-2.375) 13(0.25,-2.375) 14(0.75,-2.375) 15(1.25,-2.375) 16(1.75,-2.375) 25(1.75,2.375) 26(1.25,2.375) 27(0.75,2.375) 28(0.25,2.375) 29(-0.25,2.375) 30(-0.75,2.375) 31(-1.25,2.375) 32(-1.75,2.375)
  rect 3.7x3.7 smd: 33(0,0)
  silkscreen extent -3.45,-2.67 2.68,2.68, body extent -2.52,-2.52 2.53,2.53, height 0.9
FP-0603-L_1_6_0_2-W_0_8_0-IPC_B [mil]
  rect 41.64x39.85 smd paste+0 mask+0: 1(-28.63,0) 2(28.63,0)
  silkscreen extent -49,-36 49,36, body extent -59,-30 59,30, height 10
FP-1206L050YR-MFG [mm]
  rect 1x1.8 smd paste+0 mask+0: 1(-1.4,0) 2(1.4,0)
  silkscreen extent -0.53,-0.9 0.53,0.9, body extent -2,-1 2,1, height 0.25
FP-ABM8G-MFG [mm]
  rect 1.4x1.2 smd paste+0 mask+0: 1(-1.1,-0.85) 2(1.1,-0.85) 3(1.1,0.85) 4(-1.1,0.85)
  silkscreen extent -2.47,-1.83 1.6,1.83, body extent -1.9,-1.55 1.9,1.55, height 0.25
FP-B82789C0513N002-0 [mm]
  rect 1.85x1.7 smd paste+0 mask+0: 1(-2.025,-1.15) 2(2.025,-1.15) 3(2.025,1.15) 4(-2.025,1.15)
  silkscreen extent -3.63,-1.75 0.72,1.75, body extent -3.05,-2.1 3.05,2.1, height 0.25
FP-BLM18-0_15-t0_8-IPC_A [mil]
  rect 51.42x41.66 smd paste+0 mask+0: 1(-30.55,0) 2(30.55,0)
  silkscreen extent -56,-37 56,37, body extent -76,-41 76,41, height 10
FP-BLM21-0_2-t0_85-e0_5-IPC_C [mil]
  rect 41.53x53.39 smd paste+0 mask+0: 1(-28.57,0) 2(28.57,0)
  silkscreen extent -49,-44 49,44, body extent -53,-32 53,32, height 10
FP-C0603C-CF-MFG [mm]
  rect 0.75x0.9 smd paste+0 mask+0: 1(-0.6,0) 2(0.6,0)
  silkscreen extent -0.87,-0.85 0.88,0.85, body extent -1.2,-0.6 1.2,0.6, height 0.25
FP-C1210C472KGRAC7800-MFG [mm]
  rect 0.95x2.6 smd paste+0 mask+0: 1(-1.4,0) 2(1.4,0)
  silkscreen extent -0.55,-1.35 0.55,1.35, body extent -2,-1.45 2,1.45, height 0.25
FP-CC0603-DA-MFG [mm]
  rect 0.8x0.9 smd paste+0 mask+0: 1(-0.75,0) 2(0.75,0)
  silkscreen extent -0.85,-0.85 0.85,0.85, body extent -1.35,-0.75 1.35,0.75, height 0.25
FP-CC0603-DC-IPC_C [mil]
  rect 37.59x35.68 smd paste+0 mask+0: 1(-22.66,0) 2(22.66,0)
  silkscreen extent -41,-35 41,35, body extent -45,-24 45,24, height 10
FP-CC0603-DC-MFG [mm]
  rect 0.8x0.9 smd paste+0 mask+0: 1(-0.75,0) 2(0.75,0)
  silkscreen extent -0.85,-0.87 0.85,0.87, body extent -1.43,-0.82 1.43,0.82, height 0.25
FP-CRCW0603-e3-IPC_A [mil]
  rect 44.69x41.82 smd paste+0 mask+0: 1(-32.1,0) 2(32.1,0)
  silkscreen extent -30,-37 30,37, body extent -74,-41 74,41, height 10
FP-CRCW1206-e3-MFG [mm]
  rect 1.05x1.8 smd paste+0 mask+0: 1(-1.275,0) 2(1.275,0)
  silkscreen extent -0.38,-0.87 0.38,0.87, body extent -1.9,-1 1.9,1, height 0.25
FP-DQA0010A-MFG [mm]
  rrect50% 0.565x0.2 smd paste+0 mask+0: 1(-0.417,1) 2(-0.417,0.5) 4(-0.417,-0.5) 5(-0.417,-1) 6(0.417,-1) 7(0.417,-0.5) 9(0.417,0.5) 10(0.417,1)
  rrect25% 0.565x0.4 smd paste-1000 mask+0: 3(-0.417,0) 8(0.417,0)
  silkscreen extent -1.38,-1.48 0.55,1.48, body extent -0.8,-1.4 0.8,1.4, height 0.25
FP-FH12-40S-0_5SH_55-MFG [mm]
  rect 0.3x1.3 smd paste-1000 mask+0: 1(-9.75,3.45) 2(-9.25,3.45) 3(-8.75,3.45) 4(-8.25,3.45) 5(-7.75,3.45) 6(-7.25,3.45) 7(-6.75,3.45) 8(-6.25,3.45) 9(-5.75,3.45) 10(-5.25,3.45) 11(-4.75,3.45) 12(-4.25,3.45) 13(-3.75,3.45) 14(-3.25,3.45) 15(-2.75,3.45) 16(-2.25,3.45) 17(-1.75,3.45) 18(-1.25,3.45) 19(-0.75,3.45) 20(-0.25,3.45) 21(0.25,3.45) 22(0.75,3.45) 23(1.25,3.45) 24(1.75,3.45) 25(2.25,3.45) 26(2.75,3.45) 27(3.25,3.45) 28(3.75,3.45) 29(4.25,3.45) 30(4.75,3.45) 31(5.25,3.45) 32(5.75,3.45) 33(6.25,3.45) 34(6.75,3.45) 35(7.25,3.45) 36(7.75,3.45) 37(8.25,3.45) 38(8.75,3.45) 39(9.25,3.45) 40(9.75,3.45)
  rect 1.8x2.2 smd paste+0 mask+0: 41(-11.65,0.2) 42(11.65,0.2)
  silkscreen extent -11.65,-2.95 11.65,4.77, body extent -12.65,-3.05 12.65,4.2, height 0.25
FP-GRM188-0_2-IPC_B [mil]
  rect 43.51x39.61 smd paste+0 mask+0: 1(-27.58,0) 2(27.58,0)
  silkscreen extent -49,-36 49,36, body extent -59,-30 59,30, height 10
FP-HSMC-C280-MFG [mm]
  rect 0.5x0.5 smd paste+0 mask+0: 1(-0.5,0) 2(0.5,0)
  silkscreen extent -1.45,-0.65 0.55,0.65, body extent -0.85,-0.4 0.85,0.4, height 0.25
FP-HSMG-C150-MFG [mm]
  rect 1.5x1.5 smd paste+0 mask+0: 1(-1.75,0) 2(1.75,0)
  silkscreen extent -0.6,-0.85 0.6,0.85, body extent -2.6,-0.95 2.6,0.95, height 0.25
FP-LQW15AN_80-MFG [mm]
  rect 0.41x0.66 smd paste+0 mask+0: 1(-0.505,0) 2(0.505,0)
  silkscreen extent -0.56,-0.74 0.55,0.75, body extent -0.81,-0.45 0.81,0.45, height 0.25
FP-PG-SOT23-3-MFG [mm]
  rect 0.9x0.8 smd paste+0 mask+0: 1(-1.1,1) 2(-1.1,-1) 3(1.1,0)
  silkscreen extent -0.28,-1.5 0.7,1.5, body extent -1.65,-1.6 1.65,1.6, height 0.25
FP-RC0603-0_55-IPC_A [mil]
  rect 41.68x39.85 smd paste+0 mask+0: 1(-34.52,0) 2(34.52,0)
  silkscreen extent -55,-36 55,36, body extent -75,-40 75,40, height 10
FP-RC0603-0_55-IPC_C [mil]
  rect 25.93x31.97 smd paste+0 mask+0: 1(-26.64,0) 2(26.64,0)
  silkscreen extent -40,-33 40,33, body extent -44,-22 44,22, height 10
FP-RC0603-0_55-MFG [mm]
  rect 0.9x0.8 smd paste+0 mask+0: 1(-0.85,0) 2(0.85,0)
  silkscreen extent 0,-0.45 0,0.45, body extent -1.4,-0.55 1.4,0.55, height 0.25
FP-RC0603-MFG [mm]
  rect 0.9x0.8 smd paste+0 mask+0: 1(-0.85,0) 2(0.85,0)
  silkscreen extent -0.03,-0.45 0.03,0.45, body extent -1.4,-0.55 1.4,0.55, height 0.25